# Altium PCB Piezo_Regulator_Head.PcbDoc (part 1 of 4)
Units mil, origin at the board's own origin, x right, y up, seen from the top; angles counter-clockwise.
Board outline 2047.24 x 1850.39 mil, 6 copper layers (Top Layer, GROUND, SIGNAL1, SIGNAL2, POWER, Bottom Layer), stack 60.866 mil thick; 136 components, 91 nets, 517 pads, 213 vias.
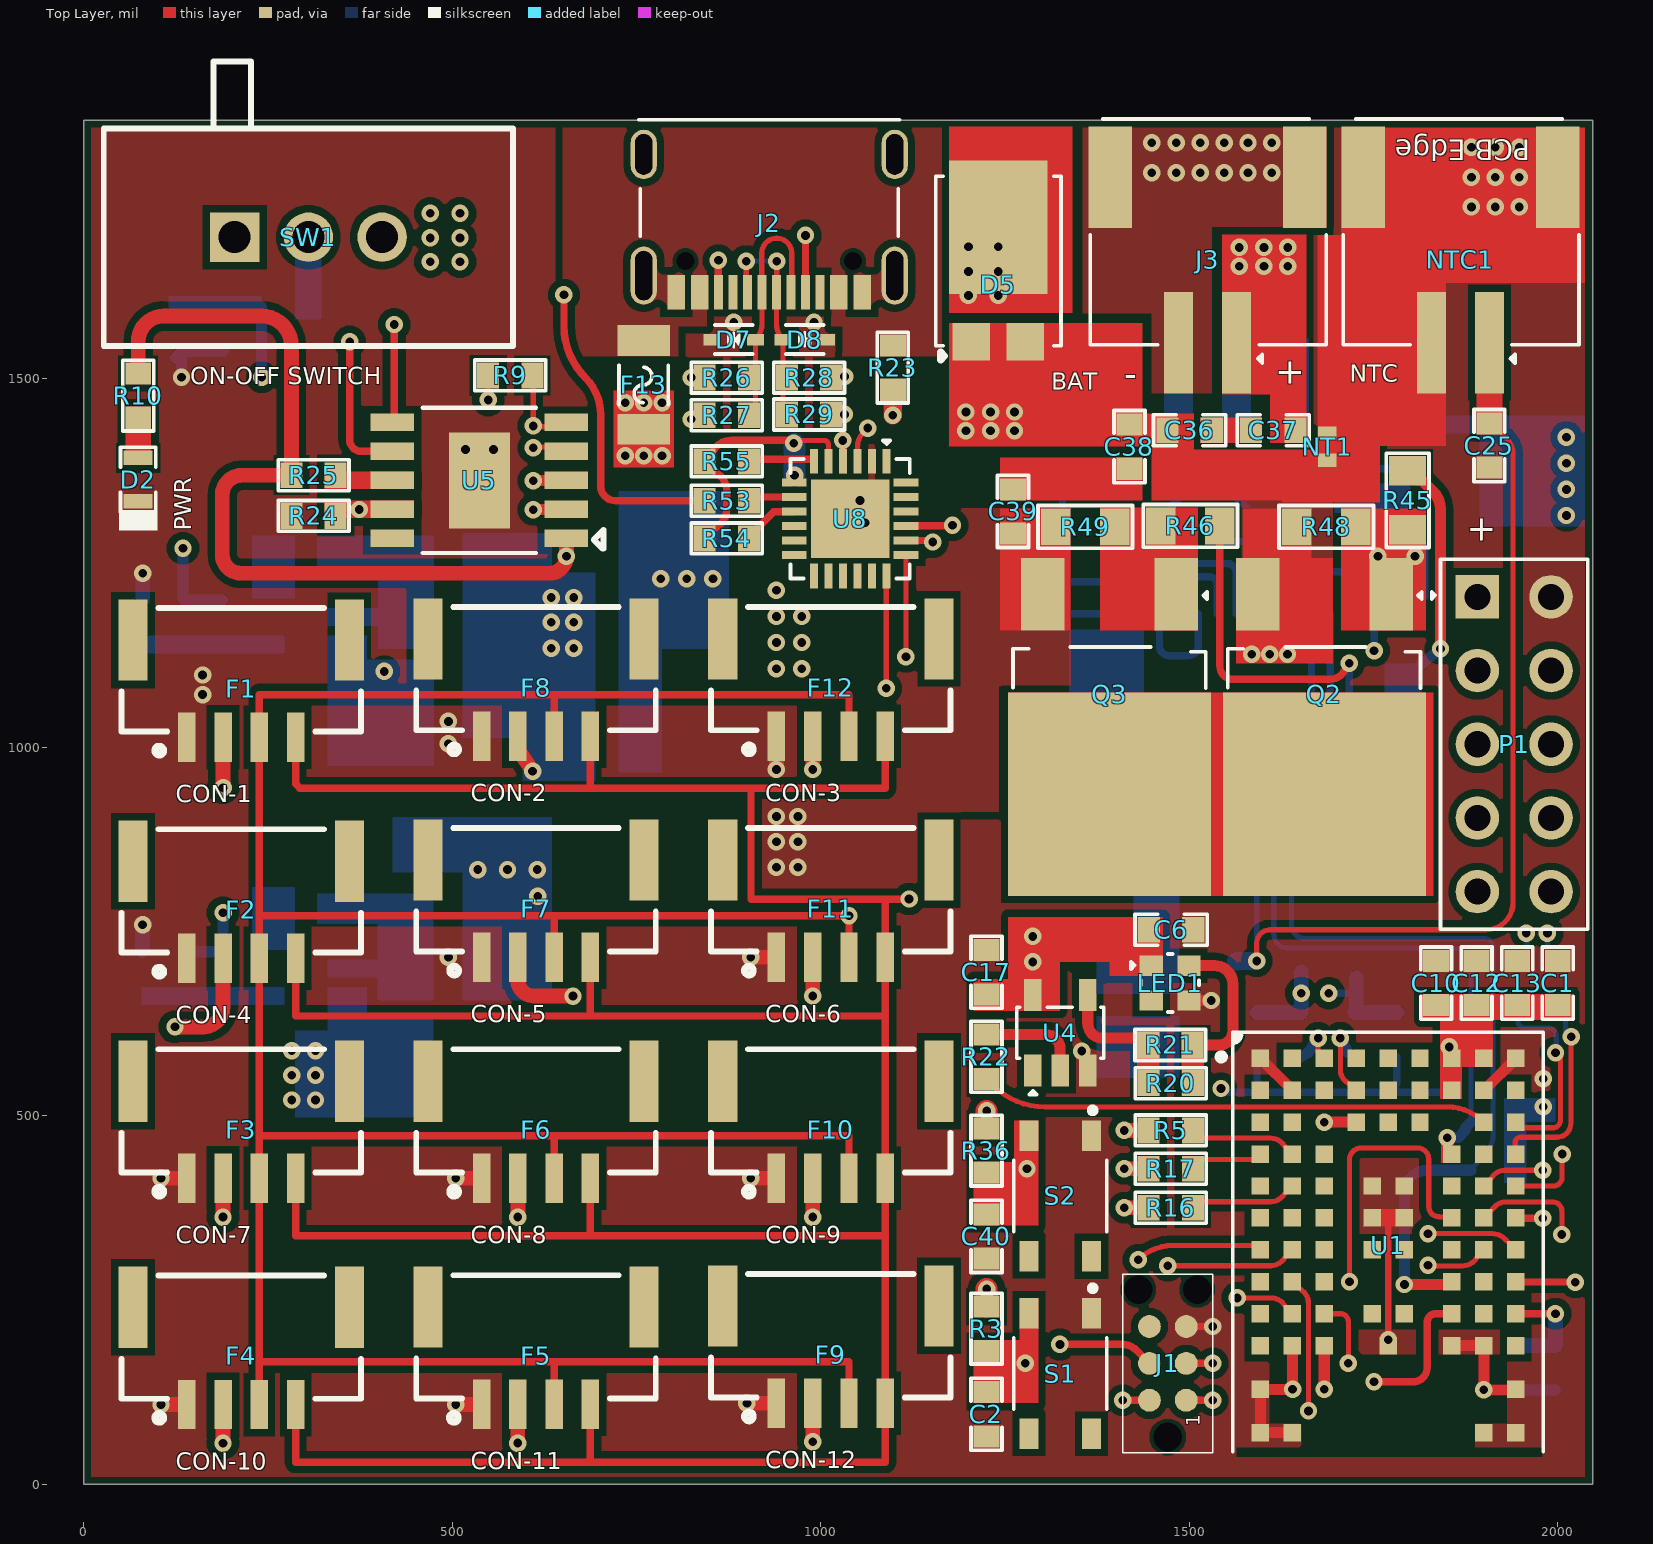
[diagram p0: Top Layer view]
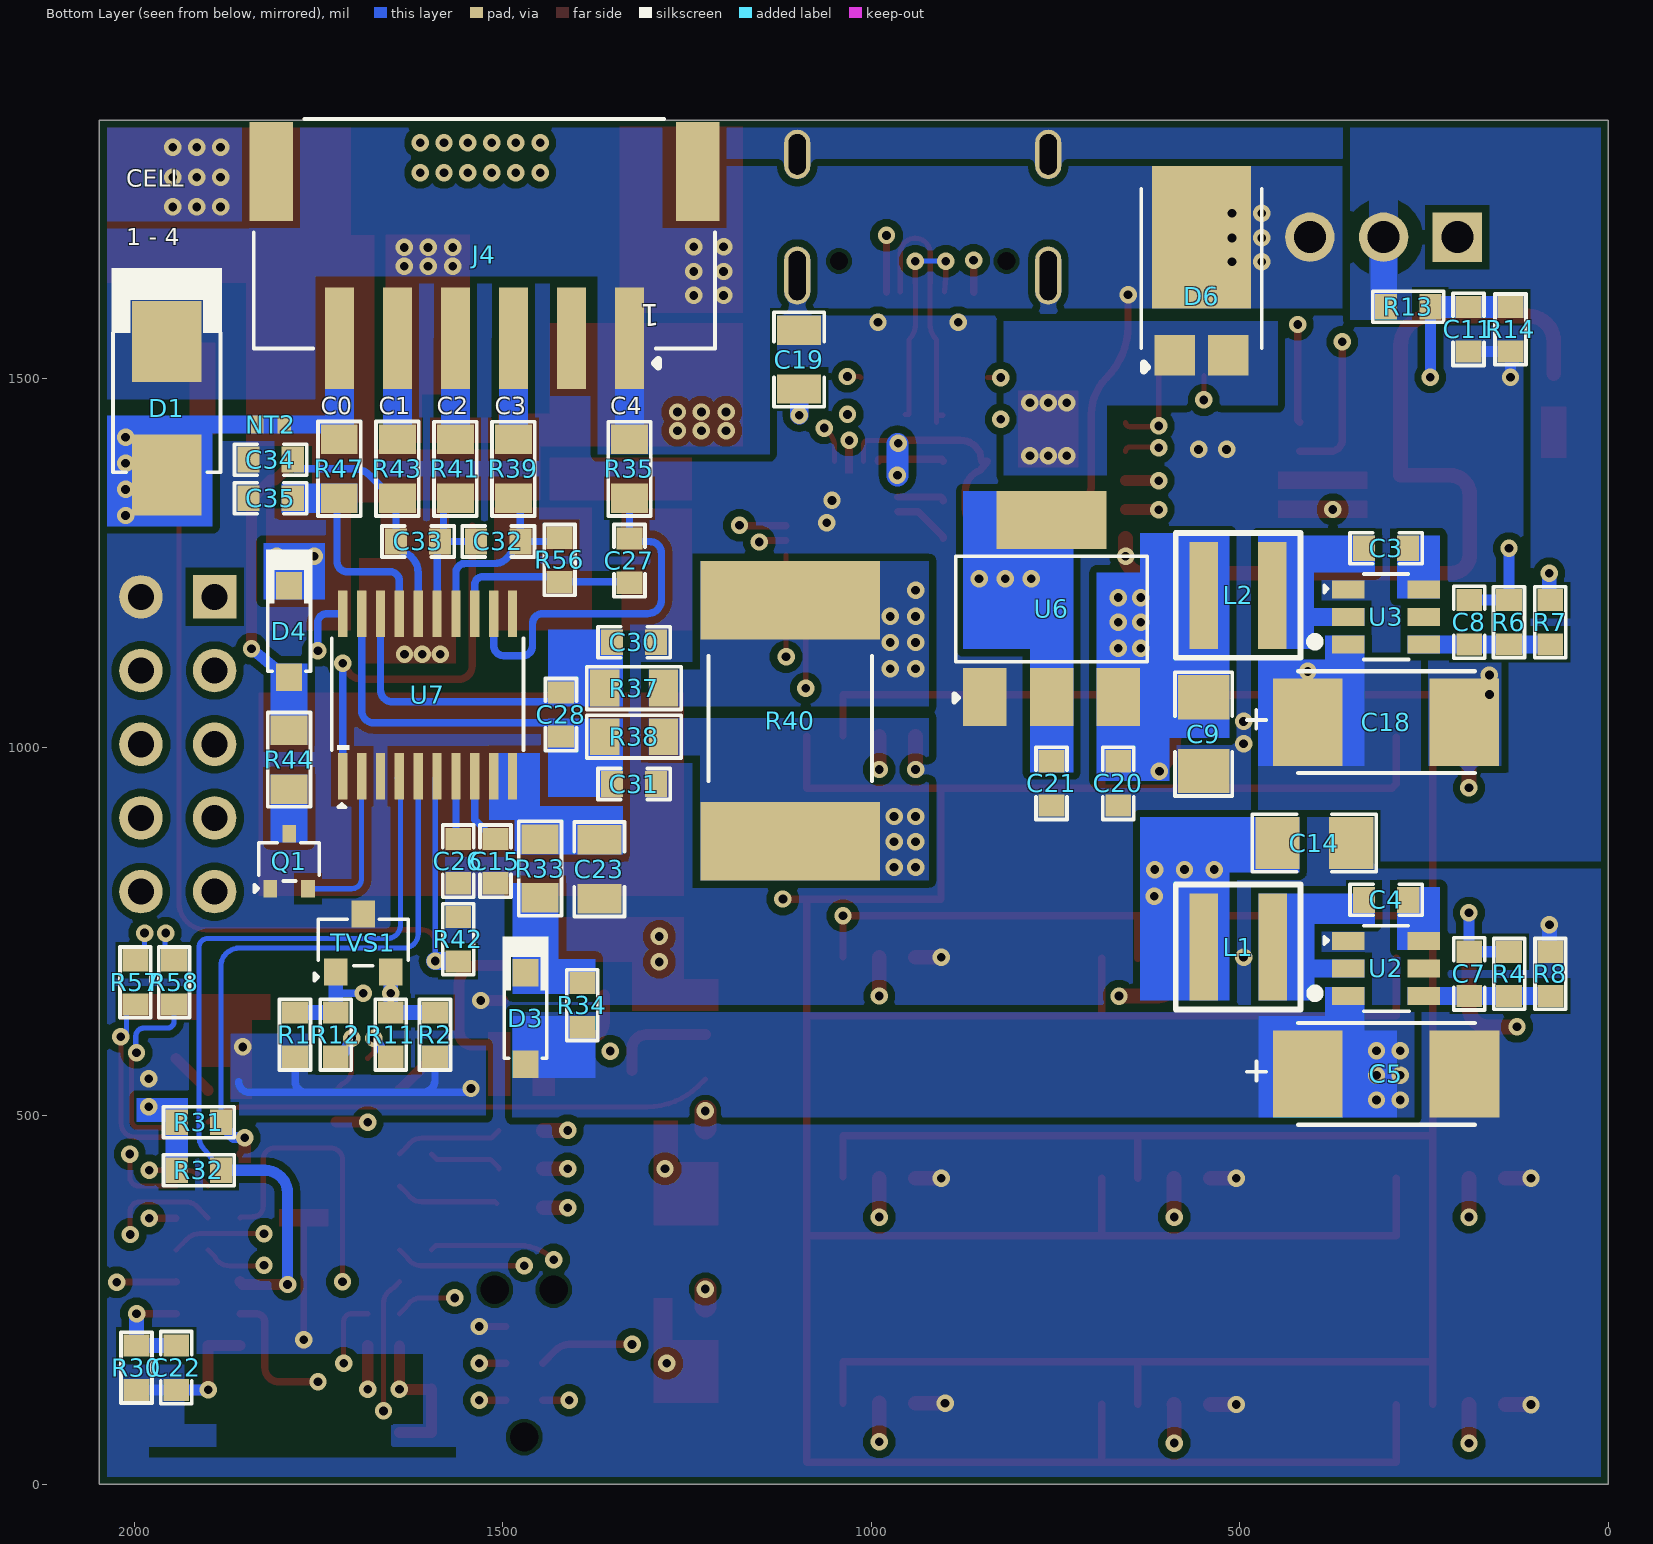
[diagram p1: Bottom Layer view, seen from below]
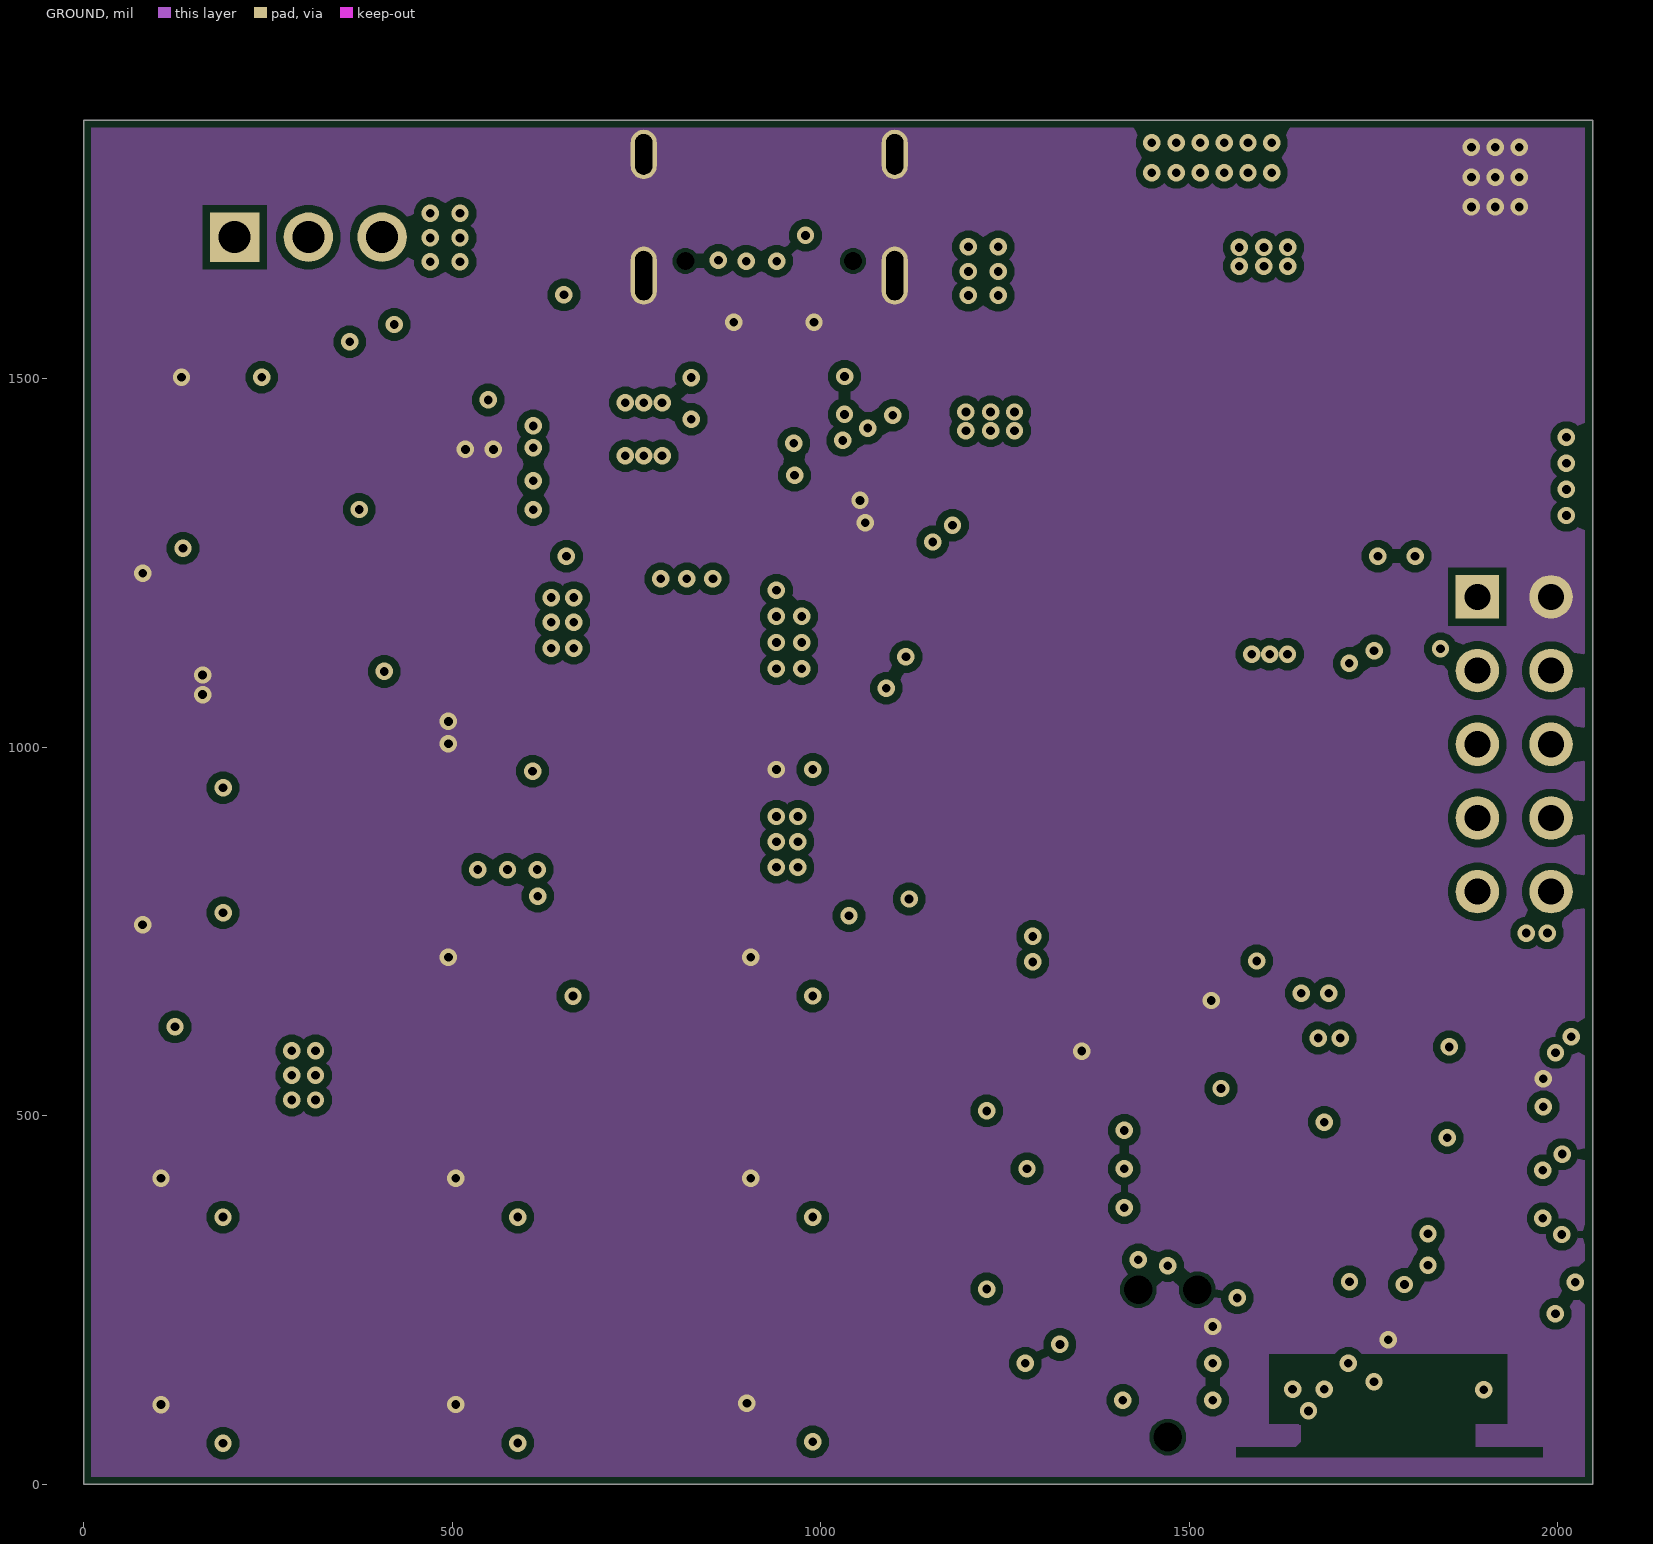
[diagram p2: GROUND]
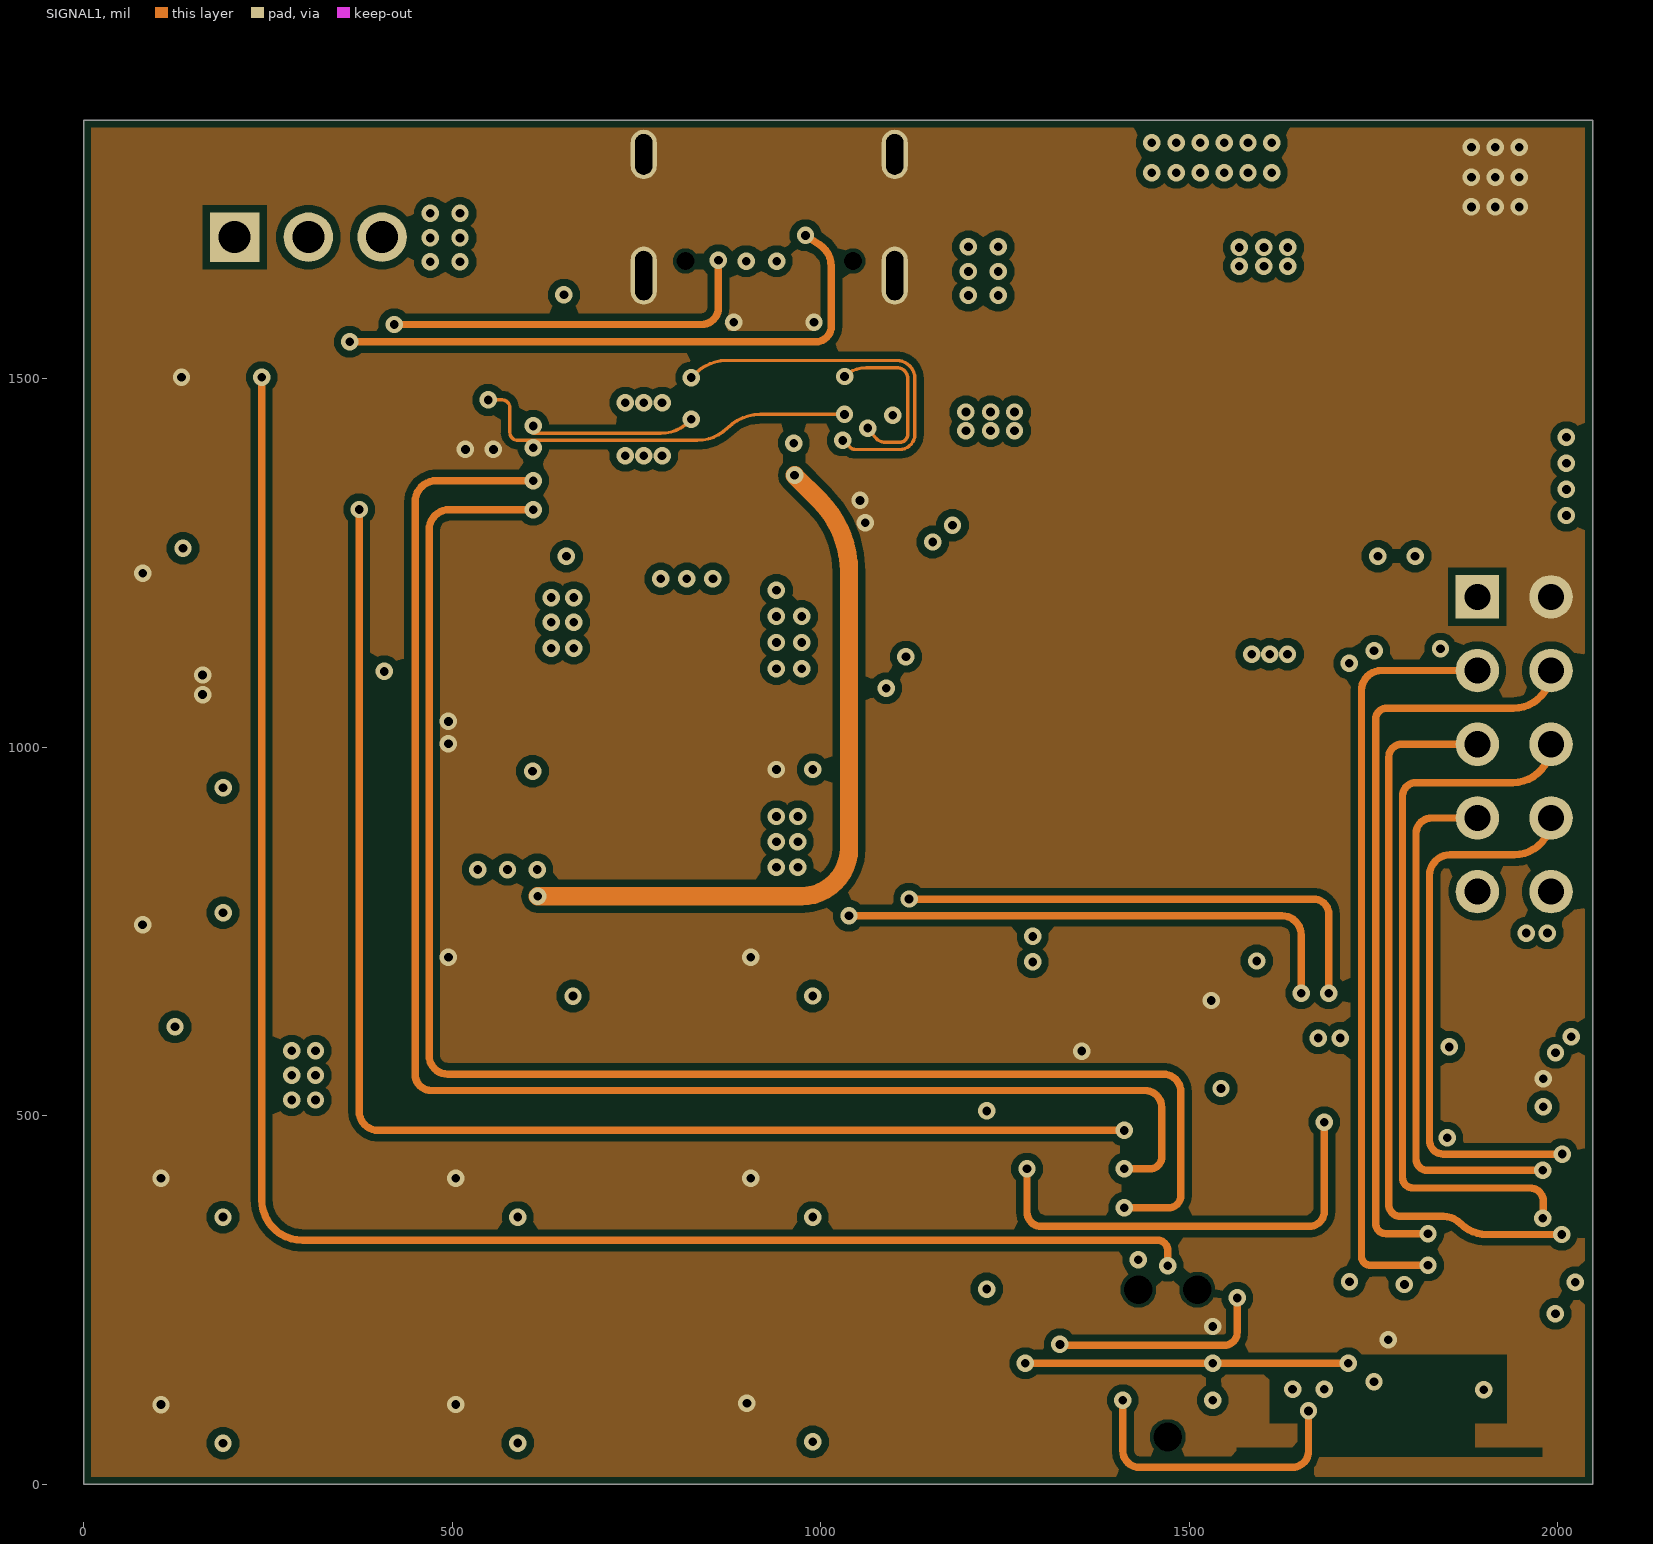
[diagram p3: SIGNAL1]
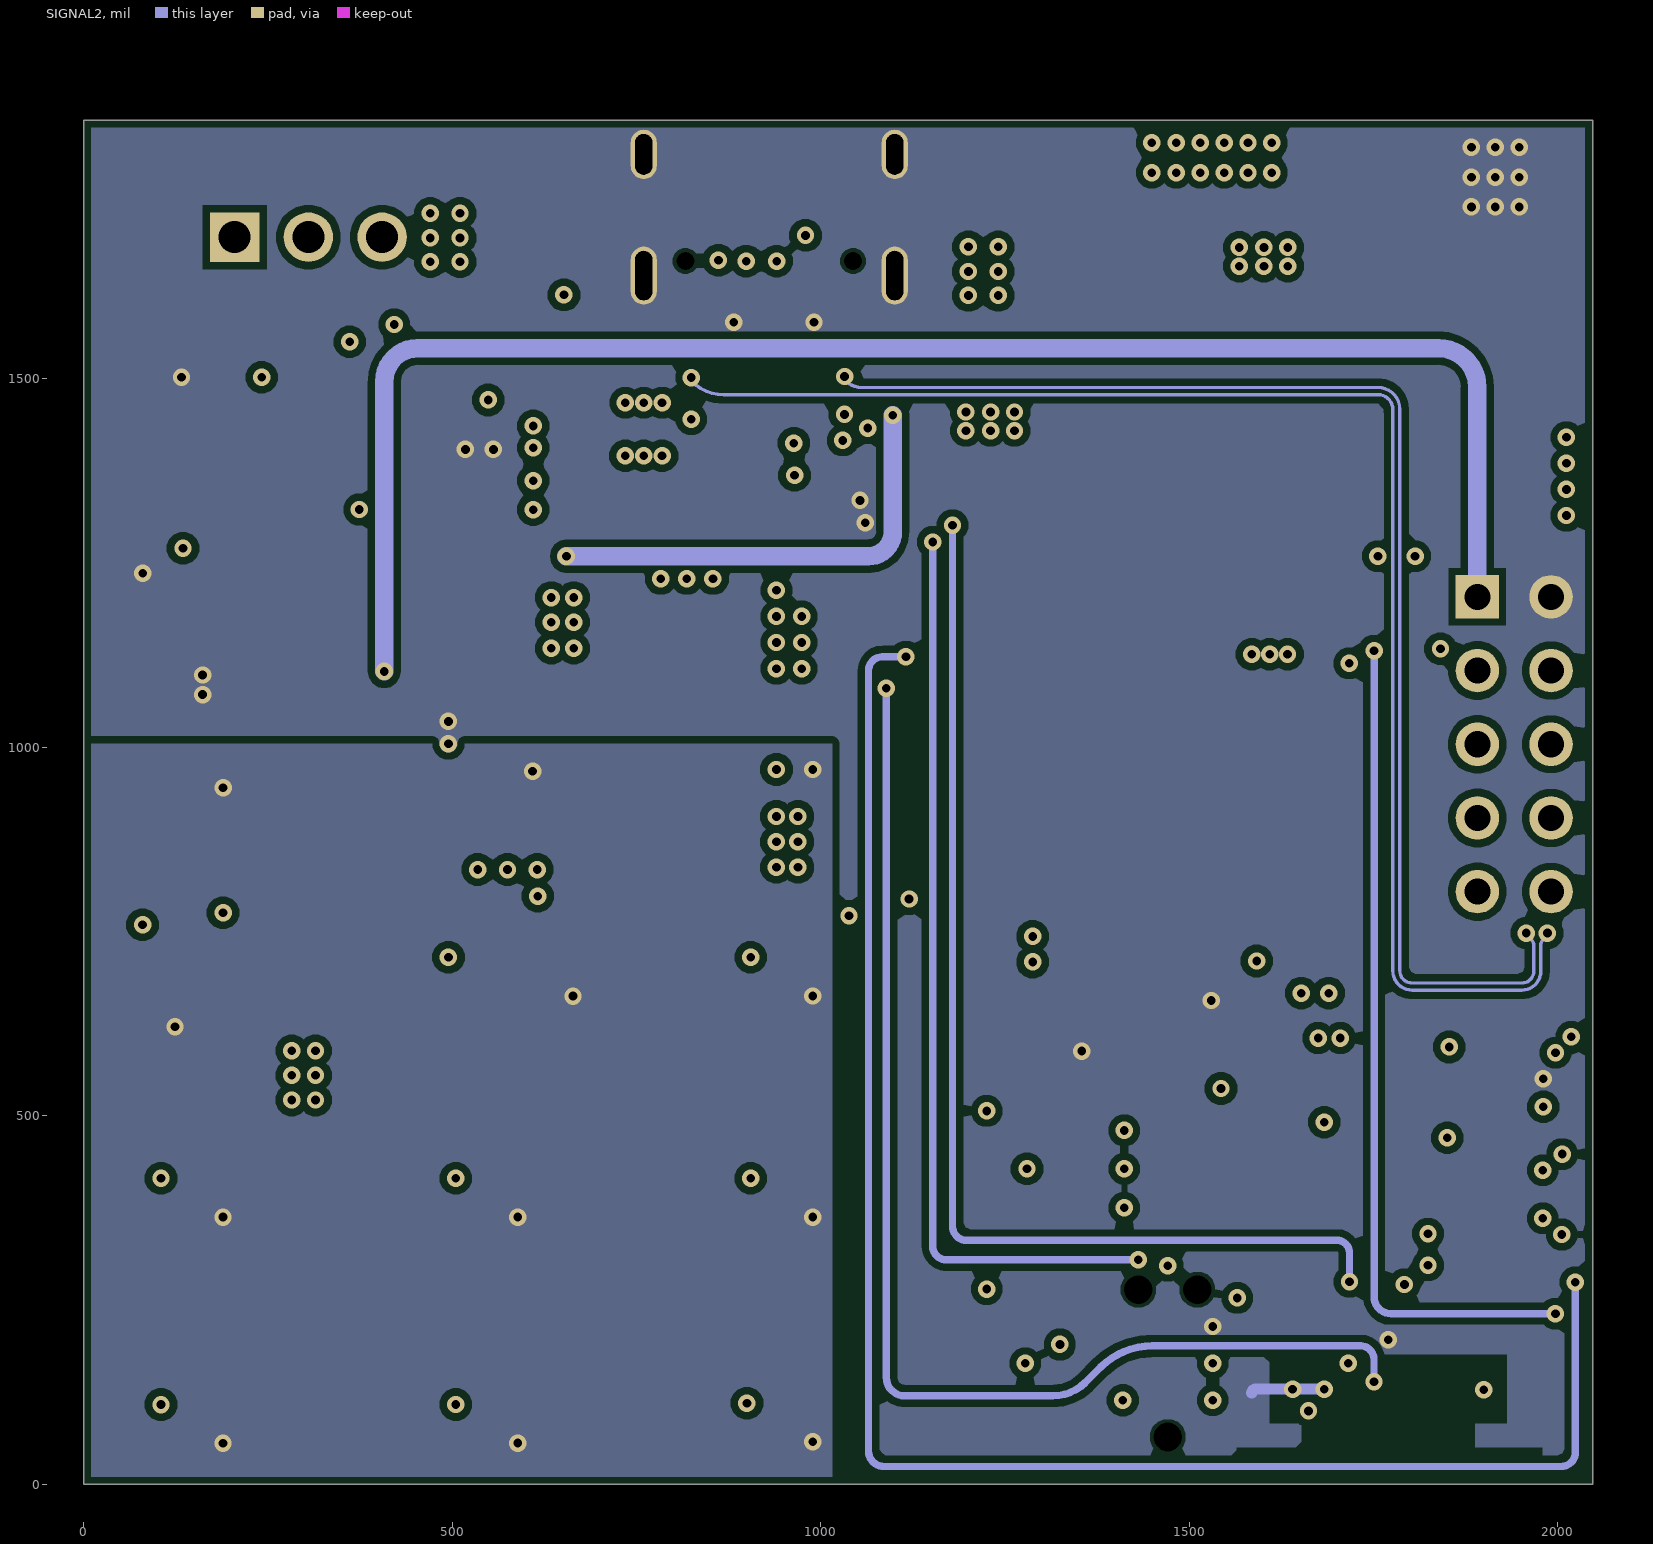
[diagram p4: SIGNAL2]
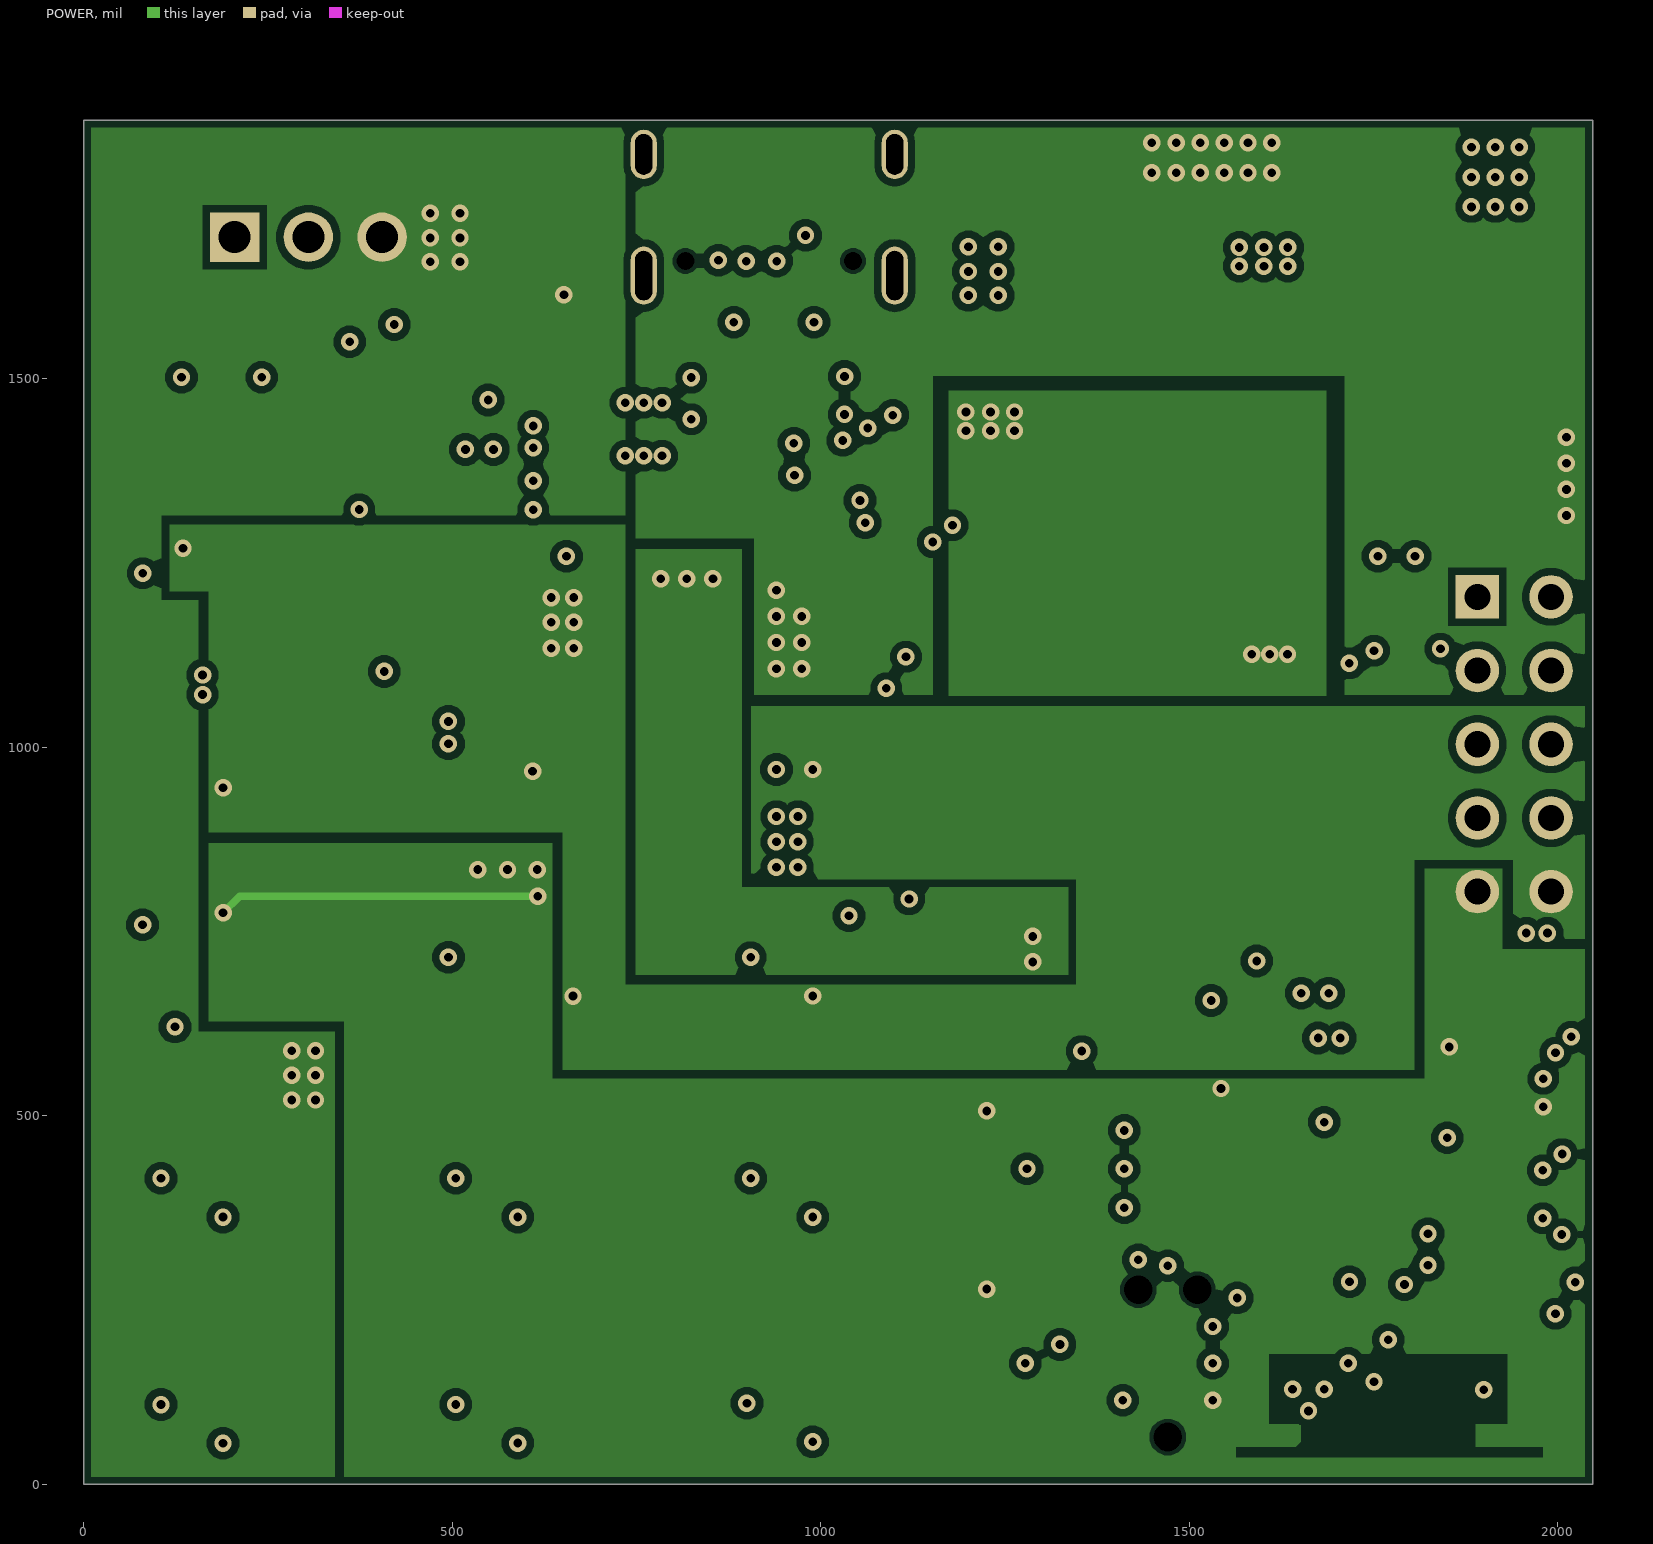
[diagram p5: POWER]
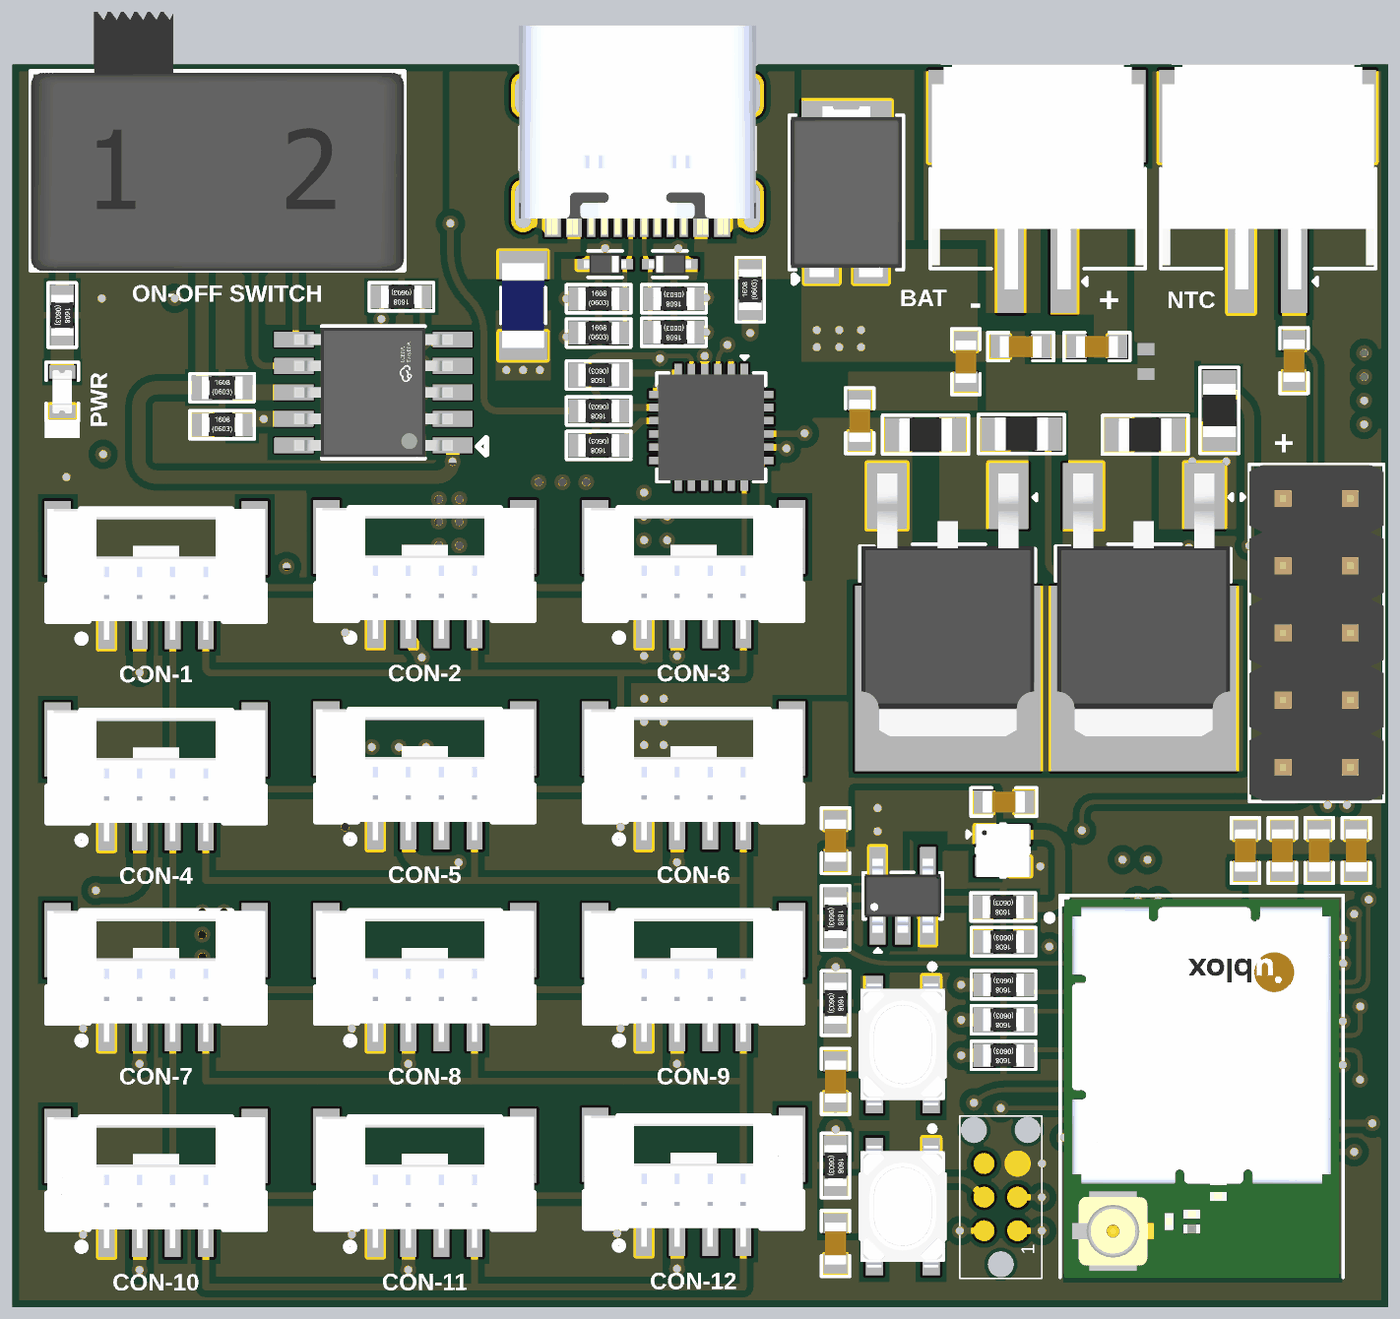
[diagram p7: 3D render of the assembled board from above, using the file's embedded part models]
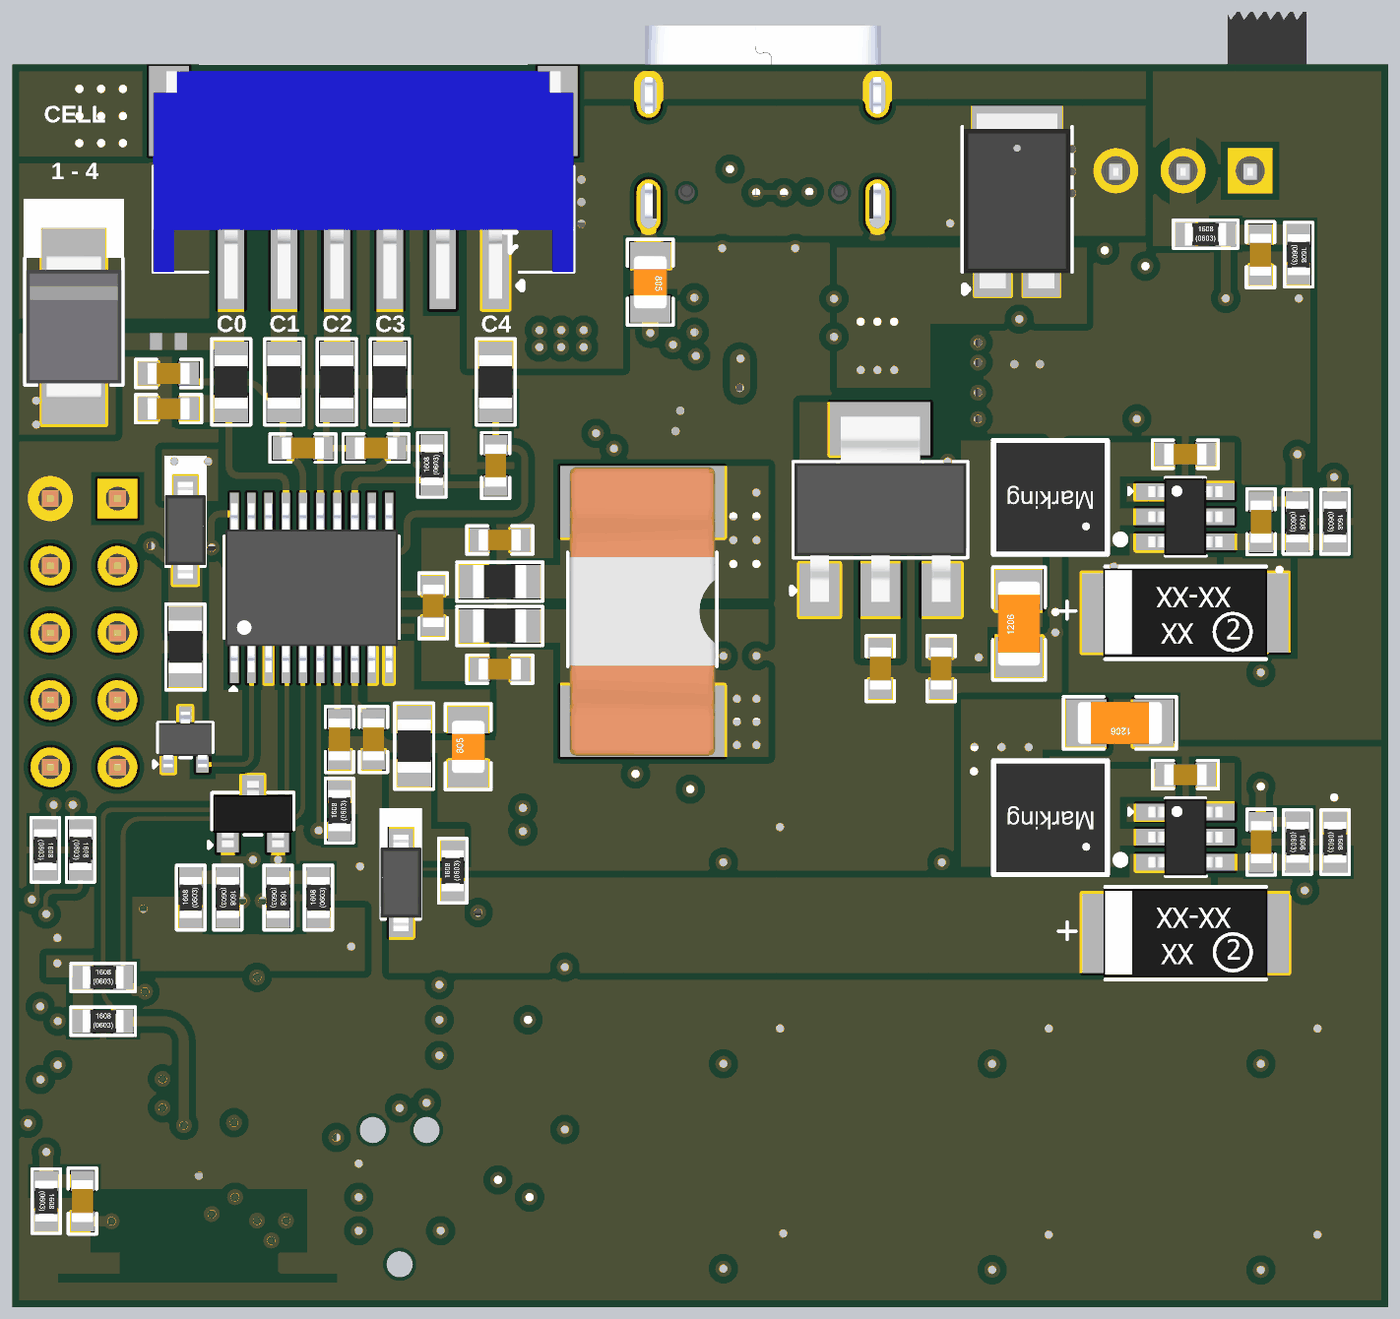
[diagram p8: 3D render of the assembled board from below, using the file's embedded part models]

## Layer stack, top to bottom
Top Solder: solder mask 0.4, Solder Resist, Dk 3.5
Top Layer: signal copper 1.378
Dielectric 2: prepreg 3.9134, PP-006, Dk 4.4
GROUND: signal copper 0.5984
Dielectric 4: prepreg 21.6535, PP-006, Dk 4.1
SIGNAL1: signal copper 0.5984
Dielectric 1: dielectric 4.5827, FR-4, Dk 4.6
SIGNAL2: signal copper 0.5984
Dielectric 5: prepreg 21.6535, PP-006, Dk 4.1
POWER: signal copper 0.5984
Dielectric 3: prepreg 3.9134, PP-006, Dk 4.4
Bottom Layer: signal copper 1.378
Bottom Solder: solder mask 0.4, Solder Resist, Dk 3.5

## Board outline
0,0 0,1850.39 2047.24,1850.39 2047.24,0

## Design rules (kind name [scope] priority, off if disabled: settings)
BoardOutlineClearance [All] p1: gap=0 ignorepadtopadclearanceinfootprint=FALSE except(10: Poly-OutlineEdge)
Clearance [All] p1: gap=5 ignorepadtopadclearanceinfootprint=FALSE except(10: Arc-Poly Arc-Text Track-Poly Track-Text SMDPad-Poly SMDPad-Text THPad-Poly THPad-Text Via-Poly Via-Text Fill-Poly Fill-Text Poly-Poly Poly-Text Region-Text Text-Text)
ComponentClearance [All] p1: gap=0 collisioncheckmode=3 verticalgap=0 showdistances=FALSE
DiffPairsRouting [All] p1: maxlimit=12 minlimit=5 mostfreqgap=5 toplayer_mingap=12 toplayer_prefgap=12 toplayer_minwidth=7 toplayer_maxwidth=7 toplayer_prefwidth=7 midlayer1_maxgap=5 midlayer1_minwidth=4.23 midlayer1_maxwidth=4.23 midlayer1_prefwidth=4.23 midlayer2_maxgap=5 midlayer2_minwidth=4.23 midlayer2_maxwidth=4.23 midlayer2_prefwidth=4.23 midlayer3_maxgap=5 midlayer3_minwidth=4.61 midlayer3_maxwidth=4.61 midlayer3_prefwidth=4.61 midlayer4_maxgap=5 midlayer4_minwidth=4.61 midlayer4_maxwidth=4.61 midlayer4_prefwidth=4.61 bottomlayer_mingap=12 bottomlayer_prefgap=12 bottomlayer_minwidth=7 bottomlayer_maxwidth=7 bottomlayer_prefwidth=7 impedanceprofiledriven=TRUE impedanceprofileid={20A96C70-0C57-4419-ABD6-1D1F0772203B} impedanceprofilevalue=90.000000 maxuncoupledlength=1000
MinimumSolderMaskSliver [All] p1: minsoldermaskwidth=0
PolygonConnect [All] p1: connectstyle=Direct reliefconductorwidth=10 reliefentries=4 polygonreliefangle="90 Angle" airgapwidth=10
RoutingVias [All] p1: holewidth=11.81 width=23.62 viastyle="Through Hole" minholewidth=11.81 minwidth=23.62 maxholewidth=11.81 maxwidth=23.62
SilkToSilkClearance [All] p1: silktosilkclearance=0
SilkToSolderMaskClearance [IsPad] p1: minsilkscreentomaskgap=0 clearancetoexposedcopper=TRUE
SolderMaskExpansion [All] p1: expansion=4 istentingtop=FALSE
SupplyNets "Schematic Supply Nets_7" [InNet('BATT_P')] p1: voltage=0.000
SupplyNets "Schematic Supply Nets_5" [InNet('3V3')] p2: voltage=0.000
SupplyNets "Schematic Supply Nets_4" [InNet('GND')] p3: voltage=0.000
SupplyNets "Schematic Supply Nets_3" [InNet('12V')] p4: voltage=0.000
SupplyNets "Schematic Supply Nets_2" [InNet('20V')] p5: voltage=0.000
SupplyNets "Schematic Supply Nets_1" [InNet('5V')] p6: voltage=0.000
SupplyNets "Schematic Supply Nets" [InNet('VDD_20V')] p7: voltage=0.000
Width [All] p1: maxlimit=40 minlimit=4 preferedwidth=10 midlayer1_minwidth=10 midlayer2_minwidth=10 midlayer3_minwidth=10 midlayer4_minwidth=10 minimp=50.000000 maximp=50.000000 favimp=50.000000
25 further rules are at their usual default settings.

## Classes and differential pairs
differential pair class D1_Lines: CH_D USB_D
net class D1: CH_D_N CH_D_P USB_D_N USB_D_P
differential pair class USB_DIF: USB_D
component class Piezo_Regulator_Head_Power: C3 C4 C5 C7 C8 C9 C14 C15 C18 C19 C20 C21 C22 C23 C25 C26 C27 C28 C30 C31 C32 C33 C34 C35 C36 C37 C38 C39 D1 D2 D3 D4 D5 D6 D7 D8 F1 F2 F3 F4 F5 F6 F7 F8 F9 F10 F11 F12 F13 J2 J3 J4 J6 L1 L2 NT1 NT2 NTC1 Q1 Q2 Q3 R4 R6 R7 R8 R9 R10 R23 R24 R25 R26 R27 R28 R29 R30 R31 R32 R33 R34 R35 R37 R38 R39 R40 R41 R42 R43 R44 R45 R46 R47 R48 R49 R53 R54 R55 R56 SW1 U2 U3 U5 U6 U7 U8
component class Piezo_Regulator_Head_MCU: C1 C2 C6 C10 C11 C12 C13 C17 C40 J1 LED1 P1 R1 R2 R3 R5 R11 R12 R13 R14 R16 R17 R20 R21 R22 R36 R57 R58 S1 S2 TVS1 U1 U4
differential pair CH_D: +CH_D_P -CH_D_N
differential pair USB_D: +USB_D_P -USB_D_N
differential pair D: +D_P -D_N

## Components (designator, comment, footprint, x,y, rotation, side; value= is the part's Value field where it differs from the comment)
C1 "4.7uF" Cap-0603 2000,680 r270 top value=4.7µF
C2 "100nF" Cap-0603 1225,95 r90 top
C3 "100nF" Cap-0603 301.67,1269.88 r0 bottom
C4 "100nF" Cap-0603 301.48,792.88 r0 bottom
C5 "10uF" Case-C 301.48,556.88 r180 bottom
C6 "100nF" Cap-0603 1475.48,752.26 r180 top
C7 "47pF" Cap-0603 188.66,692.47 r90 bottom
C8 "47pF" Cap-0603 188.85,1169.48 r90 bottom
C9 "15uF" Cap-1206 549.13,1017.88 r90 bottom value=15µF
C10 "100nF" Cap-0603 1835,680 r270 top
C11 "10000pF" Cap-0603 189.81,1567 r90 bottom
C12 "100nF" Cap-0603 1890,680 r270 top
C13 "100nF" Cap-0603 1945,680 r270 top
C14 "15uF" Cap-1206 399,870 r0 bottom value=15µF
C15 "100nF" Cap-0603 1510.02,845.41 r90 bottom
C17 "100nF" Cap-0603 1225.01,694.62 r270 top
C18 "10uF" Case-C 301.67,1033.88 r180 bottom
C19 "1uF" Cap-0805 1098,1526 r270 bottom
C20 "10uF" Cap-0603 665,950.96 r90 bottom
C21 "10uF" Cap-0603 755.55,950.96 r90 bottom
C22 "470pF" Cap-0603 1943.15,158.11 r90 bottom
C23 "2.2uF" Cap-0805 1369,834.41 r90 bottom
C25 "4.7nF" Cap-0603 1907.37,1409.26 r90 top
C26 "1uF" Cap-0603 1560.61,845.41 r90 bottom
C27 "1uF" Cap-0603 1328.15,1253.17 r90 bottom
C28 "100nF" Cap-0603 1421,1044.27 r90 bottom
C30 "100nF" Cap-0603 1322,1142.27 r180 bottom
C31 "100nF" Cap-0603 1322,950 r0 bottom
C32 "1uF" Cap-0603 1506.14,1279.17 r180 bottom
C33 "1uF" Cap-0603 1615,1279.17 r180 bottom
C34 "1uF" Cap-0603 1815,1390.15 r180 bottom
C35 "1uF" Cap-0603 1815,1337.79 r180 bottom
C36 "100nF" Cap-0603 1500.63,1430.12 r180 top
C37 "100nF" Cap-0603 1614.11,1430.12 r180 top
C38 "100nF" Cap-0603 1419,1407.76 r90 top
C39 "100nF" Cap-0603 1261,1319.84 r90 top
C40 "100nF" Cap-0603 1225,336.21 r90 top
D1 "SMBJ24A" SMB_ 1956,1460 r90 bottom
D2 "QBLP617-IB" LED-0603 74,1363 r270 top
D3 "1N4148W-7-F" SOD-123 1469.23,632 r90 bottom value=2pF
D4 "1N4148W-7-F" SOD-123 1790,1157.01 r90 bottom value=2pF
D5 "SB10100L" SB10100L 1204.49,1550 r0 top
D6 "PDS760-13" Power-DI-5 552,1612 r270 bottom
D7 "ESD5B5.0ST1G" "SOD-523 (Bi-Directional)" 882.09,1553 r0 top
D8 "ESD5B5.0ST1G" "SOD-523 (Bi-Directional)" 978.43,1553 r180 top
F1 "BM04B-GHS-TBT(LF)(SN)" BM04B-GHS-TBT 213.82,1105 r180 top
F2 "BM04B-GHS-TBT(LF)(SN)" BM04B-GHS-TBT 213.82,805 r180 top
F3 "BM04B-GHS-TBT(LF)(SN)" BM04B-GHS-TBT 213.82,506.54 r180 top
F4 "BM04B-GHS-TBT(LF)(SN)" BM04B-GHS-TBT 213.82,199.65 r180 top
F5 "BM04B-GHS-TBT(LF)(SN)" BM04B-GHS-TBT 613.82,200 r180 top
F6 "BM04B-GHS-TBT(LF)(SN)" BM04B-GHS-TBT 613.82,506.54 r180 top
F7 "BM04B-GHS-TBT(LF)(SN)" BM04B-GHS-TBT 613.82,806.54 r180 top
F8 "BM04B-GHS-TBT(LF)(SN)" BM04B-GHS-TBT 613.82,1106.54 r180 top
F9 "BM04B-GHS-TBT(LF)(SN)" BM04B-GHS-TBT 1013.82,201.54 r180 top
F10 "BM04B-GHS-TBT(LF)(SN)" BM04B-GHS-TBT 1013.82,506.54 r180 top
F11 "BM04B-GHS-TBT(LF)(SN)" BM04B-GHS-TBT 1013.82,806.54 r180 top
F12 "BM04B-GHS-TBT(LF)(SN)" BM04B-GHS-TBT 1013.82,1106.54 r180 top
F13 "0458005.DR" "Fuse 1206 (3216 Metric)" 759.94,1491.48 r270 top
J1 "TC2030-MCP-NL" TC2030-MCP-NL 1471,164 r90 top
J2 "TYPE-C-31-M-12" TYPE-C-31-M-12_ 930.21,1710.88 r180 top
J3 "WAFER-PH2.0-2PWB" WAFER-PH2.0-2PWB 1525,1661.24 r180 top
J4 "S6B-PH-SM4-TB(LF)(SN)" S6B-PH-SM4-TB(LF)(SN) 1525,1668 r0 bottom
L1 "10uH" 78438357100 502.29,728.88 r0 bottom value=10µH
L2 "10uH" 78438357100 502.48,1205.88 r0 bottom value=10µH
LED1 "SK6812-EC20" SK6812-EC20 1474,680 r180 top
NT1 "Net Tie_SMD" "Net Tie Pad" 1687.11,1407.81 r90 top net-tie
NT2 "Net Tie_SMD" "Net Tie Pad" 1815,1437.79 r180 bottom net-tie
NTC1 "WAFER-PH2.0-2PWB" WAFER-PH2.0-2PWB 1868,1661.24 r180 top
P1 "61301021121" "HDR 2x5 TH (Male)" 1941,1004 r270 top
Q1 "BSS84W-7-F" SOT-323 1790,845.41 r180 bottom
Q2 "IPD034N06N3G" TO-252-2L 1683.54,1071.97 r180 top
Q3 "IPD034N06N3G" TO-252-2L 1392.07,1071.97 r180 top
R1 "2.2K" Res-0603 1782,610 r270 bottom
R2 "2.2K" Res-0603 1592,610 r270 bottom
R3 "10K" Res-0603 1225,211.02 r90 top
R4 "100K" Res-0603 134.66,692.48 r90 bottom value=100kR
R5 "DNP" Res-0603 1475,480.07 r0 top
R6 "100K" Res-0603 134.85,1169.48 r90 bottom value=100kR
R7 "4.99K" Res-0603 78.85,1169.48 r90 bottom value=4.99kR
R8 "22.1K" Res-0603 78.66,692.48 r90 bottom
R9 "DNP" Res-0603 578.85,1504.44 r0 top
R10 "10K" Res-0603 74,1477 r90 top
R11 "47R" Res-0603 1652,610 r90 bottom
R12 "47R" Res-0603 1726.8,610 r90 bottom
R13 "1M" Res-0603 271.54,1597.51 r0 bottom
R14 "120K" Res-0603 132.81,1567 r90 bottom value=120kR
R16 "DNP" Res-0603 1475,375 r0 top
R17 "DNP" Res-0603 1475,427.95 r0 top
R20 "DNP" Res-0603 1475,544.21 r0 top
R21 "470R" Res-0603 1474.48,596 r0 top
R22 "47R" Res-0603 1225,580 r90 top
R23 "1K" Res-0603 1098,1515 r270 top
R24 "DNP" Res-0603 311.97,1313.82 r180 top
R25 "10K" Res-0603 311.97,1369 r180 top
R26 "0R" Res-0603 872.56,1501.48 r180 top
R27 "DNP" Res-0603 872.56,1450.46 r180 top
R28 "0R" Res-0603 984.43,1501.48 r0 top
R29 "DNP" Res-0603 984.41,1451.49 r0 top
R30 "499K" Res-0603 1996.95,158.11 r90 bottom
R31 "4.7K" Res-0603 1912.37,491.26 r0 bottom
R32 "4.7K" Res-0603 1912.37,426 r0 bottom
R33 "100R" RES-0805 1449.37,835.41 r90 bottom
R34 "10K" Res-0603 1392.07,650 r270 bottom
R35 "100R" RES-0805 1328.15,1377.7 r270 bottom
R36 "10K" Res-0603 1225,452.76 r90 top
R37 "100R" RES-0805 1322,1080.27 r0 bottom
R38 "100R" RES-0805 1322,1014.27 r0 bottom
R39 "100R" RES-0805 1485.63,1377.73 r270 bottom
R40 "1mΩ" "RES 3920" 1110,1036 r270 bottom
R41 "100R" RES-0805 1564.37,1377.76 r270 bottom
R42 "10K" Res-0603 1560.61,739.43 r270 bottom
R43 "100R" RES-0805 1643.11,1377.79 r270 bottom
R44 "1K" RES-0805 1790,983.12 r270 bottom value=1kR
R45 "1M" RES-0805 1796.36,1335.02 r90 top value=1MR
R46 "0R" Res-0805 1501.64,1300.17 r180 top
R47 "100R" RES-0805 1721.85,1377.79 r270 bottom
R48 "1M" RES-0805 1686,1299 r0 top value=1MR
R49 "1M" RES-0805 1359,1299 r0 top value=1MR
R53 "10K" Res-0603 872.56,1334.44 r0 top
R54 "1K" Res-0603 872.56,1283.26 r0 top value=1kR
R55 "DNP" Res-0603 872.56,1387.76 r0 top
R56 "0R" Res-0603 1423,1254.17 r270 bottom
R57 "DNP" Res-0603 1998.53,681 r90 bottom
R58 "DNP" Res-0603 1946,681 r90 bottom
S1 "SKRPABE010" SKRPABE010 1325,150 r270 top
S2 "SKRPABE010" SKRPABE010 1325,391.21 r270 top
SW1 "25336NA" 25336NA 305,1737.28 r180 top
TVS1 "NUP2105LT1G" SOT-23 1689.4,734.37 r180 bottom value=30pF
U1 "NORA-B120-00B" NORA-B120-00B 1769.92,361.34 r180 top locked
U2 "TPS54202DDCR" "SOT-23-6 THIN" 301.48,699.88 r180 bottom
U3 "TPS54202DDCR" "SOT-23-6 THIN" 301.67,1176.88 r180 bottom
U4 "SN74LV1T34DBVR" SOT-23-5 1325,612.73 r90 top
U5 "CH224K" ESSOP-10-150mil-1mm 537,1362 r180 top
U6 "AMS1117-5.0" "SOT- 223" 755.55,1187.96 r180 bottom
U7 "BQ7692006PWR" TSSOP-20 1602,1071 r90 bottom
U8 "CP2102N-A02-GQFN24R" "24-WQFN (4x4)" 1040,1310 r270 top

## Footprints (in the part's own frame and the unit in brackets; to place one, negate y for a bottom-side part, rotate by r counter-clockwise, add the part's x,y. Pads: shape width x height; smd on the part's side, far side on the other; paste and mask are expansions set on the pad)
"24-WQFN (4x4)" [mm]
  rect 0.85x0.28 smd: 1(-1.975,1.25) 2(-1.975,0.75) 3(-1.975,0.25) 4(-1.975,-0.25) 5(-1.975,-0.75) 6(-1.975,-1.25) 13(1.975,-1.25) 14(1.975,-0.75) 15(1.975,-0.25) 16(1.975,0.25) 17(1.975,0.75) 18(1.975,1.25)
  rect 0.28x0.85 smd: 7(-1.25,-1.925) 8(-0.75,-1.925) 9(-0.25,-1.925) 10(0.25,-1.925) 11(0.75,-1.925) 12(1.25,-1.925) 19(1.25,1.925) 20(0.75,1.925) 21(0.25,1.925) 22(-0.25,1.925) 23(-0.75,1.925) 24(-1.25,1.925)
  rect 2.7x2.7 smd: 25(0,0)
  silkscreen extent -2.69,-2.06 2.06,2.06, body extent -2,-2 2,2, height 0.8
25336NA [mm]
  rect 1.7x1.7 hole 1.1 paste-2539.97 mask+0: 1(2.54,1.15)
  round 1.7 hole 1.1 paste-2539.97 mask+0: 2(-2.54,1.15) 3(0,1.15)
  silkscreen extent -7.05,-4.9 7.05,4.9, body extent -7.05,-4.86 7.05,4.94, height 8.1
78438357100 [mm]
  rect 0.98x3.7 smd: 1(-1.185,0) 2(1.185,0)
  silkscreen extent -2.75,-2.15 2.15,2.15, body extent -2.05,-2.05 2.05,2.05, height 3.1
BM04B-GHS-TBT [mm]
  rect 0.6x1.7 smd: 1(1.875,2.325) 2(0.625,2.325) 3(-0.625,2.325) 4(-1.875,2.325)
  rect 1x2.8 smd: 5(-3.725,-1.025) 6(3.725,-1.025)
  silkscreen extent -4.13,-2.12 4.13,2.12, body extent -4.13,-2.12 4.13,2.83, height 4.05
Cap-0603 [mil]
  rect 30x35 smd mask+2.36: 1(-30,0) 2(30,0)
  silkscreen extent -49,-21 49,21, body extent -32,-16 31,16, height 34
Cap-0805 [mil] "SMD 0805"
  rect 40x60 smd mask+2.76: 1(-40,0) 2(40,0)
  silkscreen extent -64,-34 64,34, body extent -39,-25 39,25, height 30
Cap-1206 [mil] "SMD 1206"
  rect 60x70 smd: 1(-50,0) 2(50,0)
  silkscreen extent -84,-39 84,39, body extent -63,-31 63,32, height 39
Case-C [mm]
  rect 2.4x3 smd: 1(-2.7,0) 2(2.7,0)
  silkscreen extent -4.8,-1.75 3.05,1.75, body extent -3.1,-1.67 3.1,1.68, height 2.46
ESSOP-10-150mil-1mm [mm]
  rect 1.5x0.6 smd paste+0 mask+0.05: 1(-3,2) 2(-3,1) 3(-3,0) 4(-3,-1) 5(-3,-2) 6(3,-2) 7(3,-1) 8(3,0) 9(3,1) 10(3,2)
  rect 2.1x3.3 smd paste+0 mask+0.05: 11(0,0)
  silkscreen extent -4.28,-2.5 1.95,2.5, body extent -3,-2.45 3,2.45, height 1.54
"Fuse 1206 (3216 Metric)" [mm] "0.126\" L x 0.062\" W x 0.026\" H (3.20mm x 1.58mm x 0.65mm)"
  rect 1.06x1.82 smd: 1(-1.528,0) 2(1.528,0)
  silkscreen extent -0.68,-0.85 0.68,0.85, body extent -1.6,-0.79 1.6,0.79, height 0.85
"HDR 2x5 TH (Male)" [mm]
  rect 1.5x1.5 hole 0.9: 1(-5.08,-1.27)
  round 1.5 hole 0.9: 2(-5.08,1.27) 3(-2.54,-1.27) 4(-2.54,1.27) 5(0,-1.27) 6(0,1.27) 7(2.54,-1.27) 8(2.54,1.27) 9(5.08,-1.27) 10(5.08,1.27)
  silkscreen extent -6.38,-2.84 6.38,2.54, body extent -6.35,-2.54 6.35,2.54, height 8.77
LED-0603 [mm]
  rect 0.5x1 smd: 1(-0.75,0) 2(0.75,0)
  silkscreen extent -1.12,-0.66 1.75,0.66, body extent -0.82,-0.37 0.82,0.36, height 0.68
"Net Tie Pad" [mil]
  rect 18x25 smd mask-10: 1(-18.5,0) 2(18.5,0)
  Top Layer region: -22.5,-71.78 18.5,-71.78 18.5,12.5 -22.5,12.5
NORA-B120-00B [mm]
  rect 0.6x0.6 smd: A1(4.4,-5.5) A2(3.3,-5.5) A3(2.2,-5.5) A4(1.1,-5.5) A5(0,-5.5) A6(-1.1,-5.5) A7(-2.2,-5.5) A8(-3.3,-5.5) A9(-4.4,-5.5) B1(4.4,-4.4) B2(3.3,-4.4) B3(2.2,-4.4) B4(1.1,-4.4) B5(0,-4.4) B6(-1.1,-4.4) B7(-2.2,-4.4) B8(-3.3,-4.4) B9(-4.4,-4.4) C1(4.4,-3.3) C2(3.3,-3.3) C4(1.1,-3.3) C5(0,-3.3) C6(-1.1,-3.3) C8(-3.3,-3.3) C9(-4.4,-3.3) D1(4.4,-2.2) D2(3.3,-2.2) D3(2.2,-2.2) D7(-2.2,-2.2) D8(-3.3,-2.2) D9(-4.4,-2.2) E1(4.4,-1.1) E2(3.3,-1.1) E3(2.2,-1.1) E4(0.55,-1.1) E5(-0.55,-1.1) E7(-2.2,-1.1) E8(-3.3,-1.1) E9(-4.4,-1.1) F1(4.4,0) F2(3.3,0) F3(2.2,0) F4(0.55,0) F5(-0.55,0) F7(-2.2,0) F8(-3.3,0) F9(-4.4,0) G1(4.4,1.1) G2(3.3,1.1) G3(2.2,1.1) G4(0.55,1.1) G5(-0.55,1.1) G7(-2.2,1.1) G8(-3.3,1.1) G9(-4.4,1.1) H1(4.4,2.2) H2(3.3,2.2) H3(2.2,2.2) H7(-2.2,2.2) H8(-3.3,2.2) H9(-4.4,2.2) J1(4.4,3.3) J2(3.3,3.3) J3(2.2,3.3) J4(0.55,3.3) J5(-0.55,3.3) J7(-2.2,3.3) J8(-3.3,3.3) J9(-4.4,3.3) K1(4.4,4.4) K2(3.3,4.4) K3(2.2,4.4) K5(0,4.4) K7(-2.2,4.4) K8(-3.3,4.4) K9(-4.4,4.4) L1(4.4,5.9) L9(-4.4,5.9) M1(4.4,7.4) M2(3.3,7.4) M8(-3.3,7.4) M9(-4.4,7.4)
  Multi-Layer pour cut-out: 4.1,7.1 3.001,7.1 2.998,7.9 5.225,7.9 5.225,8.25 -5.325,8.25 -5.325,7.9 -3,7.9 -3,7.1 -4.1,7.1 -4.1,4.7 4.1,4.7
  silkscreen extent -5.35,-6.4 5.85,8.05, body extent -5.2,-6.25 5.2,8.05, height 1.85
Power-DI-5 [mm]
  rect 1.4x1.4 smd paste+0 mask+0.051: 1(2.032,-0.92) 2(2.032,0.92)
  rect 4.9x3.4 smd paste+0 mask+0.051: 3(-2.032,0)
  silkscreen extent -3.7,-2.07 2.57,2.07, body extent -4.19,-2.02 2.41,2.02, height 1.2
"RES 3920" [mm]
  rect 2.7x6.2 smd: 1(-4.15,0) 2(4.15,0)
  silkscreen extent -2.24,-2.82 2.08,2.82, body extent -5.46,-2.75 5.46,2.77, height 1.99
Res-0603 [mil]
  rect 30x35 smd: 1(-30,0) 2(30,0)
  silkscreen extent -48,-21 48,21, body extent -31,-17 31,17, height 18
RES-0805 [mil] "SMD 0805"
  rect 40x50 smd: 1(-40,0) 2(40,0)
  silkscreen extent -64,-29 64,29, body extent -39,-25 39,24, height 24
Res-0805 [mil] "SMD 0805"
  rect 40x50 smd: 1(-40,0) 2(40,0)
  silkscreen extent -64,-29 64,29, body extent -39,-25 39,24, height 24
S6B-PH-SM4-TB(LF)(SN) [mm]
  rect 1x3.5 smd: 1(-5,2.875) 2(-3,2.875) 3(-1,2.875) 4(1,2.875) 5(3,2.875) 6(5,2.875)
  rect 1.5x3.4 smd: MP1(-7.35,-2.875) MP2(7.35,-2.875)
  silkscreen extent -7.95,-4.68 7.95,3.86, body extent -7.95,-4.38 7.95,4.22, height 5.6
SB10100L [mm]
  rect 1.3x1.3 smd: 1(0,0) 2(1.86,0)
  rect 3.4x4.6 smd: 3(0.93,3.95)
  silkscreen extent -1.23,-0.62 3.09,5.71, body extent -1.17,-0.41 3.03,6.04, height 1.2
SK6812-EC20 [mm]
  rect 0.8x0.7 smd: 1(0.65,-0.6) 2(0.65,0.6) 3(-0.65,0.6) 4(-0.65,-0.6)
  silkscreen extent -1,-1 1.35,1, body extent -1,-1 1,1, height 0.65
SKRPABE010 [mm]
  rect 1.05x0.65 smd: 1(-2.075,1.075) 2(2.075,1.075) 3(-2.075,-1.075) 4(2.075,-1.075)
  silkscreen extent -3.05,-1.6 1.23,1.6, body extent -2.3,-1.6 2.3,1.6, height 2.5
SMB_ [mm]
  rect 2.8x2.4 smd: 1(-2.3,0) 2(2.3,0)
  silkscreen extent -2.21,-1.91 4.83,1.91, body extent -2.7,-1.8 2.7,1.8, height 2.3
SOD-123 [mm]
  rect 0.95x0.9 smd: 1(-1.575,0) 2(1.575,0)
  silkscreen extent -1.37,-0.8 2.82,0.8, body extent -1.82,-0.77 1.83,0.78, height 1.5
"SOD-523 (Bi-Directional)" [mm]
  rect 0.6x0.4 smd: 1(-0.75,0) 2(0.75,0)
  silkscreen extent -0.65,-0.5 0.65,0.5, body extent -0.8,-0.4 0.8,0.4, height 0.7
SOT-23 [mm] "TRANS NPN 40V 0.6A SOT23"
  rect 0.82x0.92 smd: 1(-0.95,-1) 2(0.95,-1) 3(0,1)
  silkscreen extent -1.68,-1.3 1.55,0.81, body extent -1.5,-1.25 1.5,1.25, height 1.05
SOT-23-5 [mm]
  rect 1.1x0.6 smd: 1(-1.3,0.95) 2(-1.3,0) 3(-1.3,-0.95) 4(1.3,-0.95) 5(1.3,0.95)
  silkscreen extent -2.13,-1.5 0.88,1.5, body extent -1.4,-1.45 1.4,1.45, height 1.45
"SOT-23-6 THIN" [mm]
  rect 1.12x0.62 smd: 1(-1.3,0.95) 2(-1.3,0) 3(-1.3,-0.95) 4(1.3,-0.95) 5(1.3,0) 6(1.3,0.95)
  silkscreen extent -2.13,-1.47 0.79,1.47, body extent -1.4,-1.45 1.4,1.45, height 1.44
SOT-323 [mm]
  rect 0.47x0.6 smd: 1(-0.65,-0.95) 2(0.65,-0.95) 3(0,0.95)
  silkscreen extent -1.19,-1.07 1.04,0.64, body extent -1,-1.05 1,1.05, height 1.1
"SOT- 223" [mm]
  rect 1.5x2 smd: 1(-2.3,-3.05) 2(0,-3.05) 3(2.3,-3.05)
  rect 3.8x2 smd: 4(0,3.05)
  silkscreen extent -3.35,-3.2 3.3,1.8, body extent -3.25,-3.5 3.25,3.5, height 1.61
TC2030-MCP-NL [mil]
  round 31 smd paste-33: 1(-50,-25) 2(-50,25) 3(0,-25) 4(0,25) 5(50,-25) 6(50,25)
  round 20 hole 39 unplated: ""(-100,0) ""(100,-40) ""(100,40)
  silkscreen extent -121,-61 121,61
TO-252-2L [mm]
  rect 1.5x2.5 smd: 1(-2.3,-3.45) 3(2.3,-3.45)
  rect 7x7 smd: 2(0,3.45)
  silkscreen extent -3.35,-3.53 3.33,-0.2, body extent -3.27,-4.31 3.27,5.63, height 2.34
TSSOP-20 [mm]
  rect 1.6x0.32 smd: 1(-2.8,2.925) 2(-2.8,2.275) 3(-2.8,1.625) 4(-2.8,0.975) 5(-2.8,0.325) 6(-2.8,-0.325) 7(-2.8,-0.975) 8(-2.8,-1.625) 9(-2.8,-2.275) 10(-2.8,-2.925) 11(2.8,-2.925) 12(2.8,-2.275) 13(2.8,-1.625) 14(2.8,-0.975) 15(2.8,-0.325) 16(2.8,0.325) 17(2.8,0.975) 18(2.8,1.625) 19(2.8,2.275) 20(2.8,2.925)
  silkscreen extent -3.88,-3.3 1.95,3.3, body extent -3.2,-3.25 3.2,3.25, height 1.2
TYPE-C-31-M-12_ [mm]
  rect 0.6x1.2 smd: A1/B12(-3.2,2.375) A4/B9(-2.4,2.375) B1/A12(3.2,2.375) B4/A9(2.4,2.375)
  rect 0.3x1.2 smd: A5(-1.25,2.375) A6(-0.25,2.375) A7(0.25,2.375) A8(1.25,2.375) B5(1.75,2.375) B6(0.75,2.375) B7(-0.75,2.375) B8(-1.75,2.375)
  round 0 hole 0.62 unplated: MH(-2.89,1.305) MH(2.89,1.305)
  oval 0.9x2 hole 0.6 slot 1.7 at 90 deg: S1(4.325,1.805) S4(-4.325,1.805)
  oval 0.9x1.7 hole 0.6 slot 1.4 at 90 deg: S2(4.325,-2.375) S3(-4.325,-2.375)
  silkscreen extent -4.5,-3.57 4.5,0.44, body extent -4.47,-5.01 4.47,2.89, height 3.31
WAFER-PH2.0-2PWB [mm]
  rect 1x3.5 smd: 1(-1,2.85) 2(1,2.85)
  rect 1.5x3.5 smd: MP1(-3.35,-2.85) MP2(3.35,-2.85)
  silkscreen extent -4.09,-4.85 4.04,3.56, body extent -4.03,-4.8 3.97,3.7, height 5.59

## Part data
C1: library part GRM188R6YA475KE15D, "CAP CER 4.7UF 35V X5R 0603", Case Code (Imperial)=0603, Case Code (Metric)=1608, Dielectric=X5R, Dielectric Material=Ceramic, Manufacturer=Murata, Manufacturer Lifecycle Status="IN PRODUCTION", Max Operating Temperature=85°C, Min Operating Temperature=-55°C, Tolerance=10%, Voltage=35V, Case/Package=0603, ComponentLink1Description=https://datasheet.octopart.com:443/GRM188R6YA475KE15D-Murata-datasheet-27203393.pdf?src-supplier=Newark, ComponentLink1URL=https://datasheet.octopart.com:443/GRM188R6YA475KE15D-Murata-datasheet-27203393.pdf?src-supplier=Newark, ComponentLink2Description=https://datasheet.octopart.com:443/GRM188R6YA475KE15D-Murata-datasheet-62317201.pdf?src-supplier=element14+APAC, ComponentLink2URL=https://datasheet.octopart.com:443/GRM188R6YA475KE15D-Murata-datasheet-62317201.pdf?src-supplier=element14+APAC, ComponentLink3Description=https://datasheet.octopart.com:443/GRM188R6YA475KE15D-Murata-datasheet-14397410.pdf?src-supplier=Future+Electronics, ComponentLink3URL=https://datasheet.octopart.com:443/GRM188R6YA475KE15D-Murata-datasheet-14397410.pdf?src-supplier=Future+Electronics, ComponentLink4Description=https://datasheet.octopart.com:443/GRM188R6YA475KE15D-Murata-datasheet-165579666.pdf?src-supplier=TME, ComponentLink4URL=https://datasheet.octopart.com:443/GRM188R6YA475KE15D-Murata-datasheet-165579666.pdf?src-supplier=TME, ComponentLink5Description=https://datasheet.octopart.com:443/GRM188R6YA475KE15D-Murata-datasheet-141274968.pdf?src-supplier=Ciiva, ComponentLink5URL=https://datasheet.octopart.com:443/GRM188R6YA475KE15D-Murata-datasheet-141274968.pdf?src-supplier=Ciiva, ComponentLink6Description=https://datasheet.octopart.com:443/GRM188R6YA475KE15D-Murata-datasheet-140705175.pdf?src-supplier=Ciiva, ComponentLink6URL=https://datasheet.octopart.com:443/GRM188R6YA475KE15D-Murata-datasheet-140705175.pdf?src-supplier=Ciiva, ComponentLink7Description=https://datasheet.octopart.com:443/GRM188R6YA475KE15D-Murata-datasheet-138742923.pdf?src-supplier=Ciiva, ComponentLink7URL=https://datasheet.octopart.com:443/GRM188R6YA475KE15D-Murata-datasheet-138742923.pdf?src-supplier=Ciiva, ComponentLink8Description=https://datasheet.octopart.com/GRM188R6YA475KE15D-Murata-datasheet-12515295.pdf, ComponentLink8URL=https://datasheet.octopart.com/GRM188R6YA475KE15D-Murata-datasheet-12515295.pdf, ComponentLink9Description=https://datasheet.octopart.com/GRM188R6YA475KE15D-Murata-datasheet-12510076.pdf, ComponentLink9URL=https://datasheet.octopart.com/GRM188R6YA475KE15D-Murata-datasheet-12510076.pdf, ComponentLink10Description=https://datasheet.octopart.com/GRM188R6YA475KE15D-Murata-datasheet-11978611.pdf, ComponentLink10URL=https://datasheet.octopart.com/GRM188R6YA475KE15D-Murata-datasheet-11978611.pdf, ComponentLink11Description=https://datasheet.octopart.com/GRM188R6YA475KE15D-Murata-datasheet-10025737.pdf, ComponentLink11URL=https://datasheet.octopart.com/GRM188R6YA475KE15D-Murata-datasheet-10025737.pdf, ComponentLink12Description=https://datasheet.octopart.com/GRM188R6YA475KE15D-Murata-datasheet-8819587.pdf, ComponentLink12URL=https://datasheet.octopart.com/GRM188R6YA475KE15D-Murata-datasheet-8819587.pdf, ComponentLink13Description=https://datasheet.octopart.com:443/GRM188R6YA475KE15D-Murata-datasheet-150009168.pdf?src-supplier=Arrow.cn, ComponentLink13URL=https://datasheet.octopart.com:443/GRM188R6YA475KE15D-Murata-datasheet-150009168.pdf?src-supplier=Arrow.cn, ComponentLink14Description=http://sigma.octopart.com:80/reach_statement/Murata-company-16.pdf?src-supplier=Compliance+Statements, ComponentLink14URL=http://sigma.octopart.com:80/reach_statement/Murata-company-16.pdf?src-supplier=Compliance+Statements, Composition=Ceramic, Depth=800µm, Height=800µm, Item Type=Capacitors, Lead Free="Lead Free", Length=1.6mm, Lifecycle Status=Production, Manufacturer Part Number=GRM188R6YA475KE15D, Material=Ceramic, Mounting Technology="Surface Mount", Number of Terminals=2, Pricing="4000=0.046, 8000=0.039, 24000=0.036 (USD)", REACH SVHC=Yes, RoHS=Compliant, Schedule B="8532240020, 8532240020|8532240020|8532240020|8532240020|8532240020|8532240020|8532240020|8532240020|8532240020|8532240020|8532240020|8532240020|8532240020|8532240020|8532240020|8532240020|8532240020|8532240020|8532240020|8532240020|8532240020|8532240020|8532240020, 8532240020|8532240020|8532240020|8532240020|8532240020|8532240020|8532240020|8532240020|8532240020|8532240020|8532240020|8532240020|8532240020|8532240020|8532240020|8532240020|8532240020|8532240020|8532240020|8532240020|8532240020|8532240020|8532240020|85", Stock=256000, Supplier="Arrow Electronics", Supplier Part Number=GRM188R6YA475KE15D, Termination=SMD/SMT, Thickness=800µm, Voltage Rating=35V, Voltage Rating (DC)=35V, Weight=6.293594mg, Width=800µm
C2 C3 C4 C6 C10 C12 C13 C15 C17 C28 C30 C31 C36 C37 C38 C39 C40: library part CC0603KRX5R9BB104, "CAP CER 0.1UF 50V X5R 0603", Case Code (Imperial)=0603, Case Code (Metric)=1608, Dielectric=X5R, LCSC Part Number=C110022, Manufacturer=Yageo, Max Operating Temperature=85°C, Min Operating Temperature=-55°C, Package Quantity=4000, Supplier Part Number 1=311-4046-1-ND, Tolerance=10%, Voltage Rating=50V, Capacitance=100nF, Case/Package=0603, Category="Ceramic Capacitors", ComponentLink1Description=http://www.mouser.com/ds/2/447/Yageo_UPY-GP_NP0_16V-to-50V_9-358835.pdf?src-supplier=Mouser, ComponentLink1URL=http://www.mouser.com/ds/2/447/Yageo_UPY-GP_NP0_16V-to-50V_9-358835.pdf?src-supplier=Mouser, ComponentLink2Description=https://www.yageo.com/upload/media/product/productsearch/datasheet/mlcc/UPY-GPHC_X5R_4V-to-50V_26.pdf?src-supplier=Digi-Key, ComponentLink2URL=https://www.yageo.com/upload/media/product/productsearch/datasheet/mlcc/UPY-GPHC_X5R_4V-to-50V_26.pdf?src-supplier=Digi-Key, ComponentLink3Description=http://www.yageo.com/exep/pages/download/literatures/ProductSelectionGuide%202014_Final_2.pdf?src-supplier=Digi-Key, ComponentLink3URL=http://www.yageo.com/exep/pages/download/literatures/ProductSelectionGuide%202014_Final_2.pdf?src-supplier=Digi-Key, Halogen Free="Halogen Free", Item Type=Capacitor, Lead Free="Lead Free", Length=0.063inch, Manufacturer Part Number=CC0603KRX5R9BB104, Mount="Surface Mount", Packaging="Tape and Reel", Pricing 1="1=0.10000, 10=0.05200, 50=0.02820, 100=0.02310, 500=0.01648, 1000=0.01294 (USD)", RoHS=Yes, Stock 1=152253, Supplier 1=Digi-Key, Termination=SMD/SMT, Thickness=0.035inch, Voltage Rating (DC)=50V, Weight=7.1E-05oz, Width=0.031inch
C5 C18: library part TAJC106K035RNJ, "CAP TANT 10UF 10% 35V 2312", Case Code (Imperial)=2312, Case Code (Metric)=6032, Case/Package=Molded, Dielectric Material=Tantalum, ESR (Equivalent Series Resistance)=1.6R, LCSC Part Number=C7211, Leakage Current=3.5uA, Manufacturer="Kyocera AVX", Max Operating Temperature=125°C, Min Operating Temperature=-55°C, Package Quantity=500, Ripple Current=262mA, Tolerance=20%, Voltage=25V, Voltage Rating=35V, ComponentLink1Description=https://datasheet.ciiva.com/11793/0900766b80ccdc61-11793205.pdf?src-supplier=Rs, ComponentLink1URL=https://datasheet.ciiva.com/11793/0900766b80ccdc61-11793205.pdf?src-supplier=Rs, ComponentLink2Description=https://datasheet.ciiva.com/26341/559442-da-01-en-tacc-c-6-0-mm-x-3-2-mm-x-2-6-mm-10-uf-26341782.pdf?src-supplier=Conrad, ComponentLink2URL=https://datasheet.ciiva.com/26341/559442-da-01-en-tacc-c-6-0-mm-x-3-2-mm-x-2-6-mm-10-uf-26341782.pdf?src-supplier=Conrad, ComponentLink3Description=https://datasheet.ciiva.com/5937/taj-5937099.pdf?src-supplier=Farnell, ComponentLink3URL=https://datasheet.ciiva.com/5937/taj-5937099.pdf?src-supplier=Farnell, ComponentLink4Description=https://datasheet.ciiva.com/7730/taj-7730983.pdf?src-supplier=Element14, ComponentLink4URL=https://datasheet.ciiva.com/7730/taj-7730983.pdf?src-supplier=Element14, ComponentLink5Description=https://datasheet.ciiva.com/7730/1703059-7730751.pdf?src-supplier=Element14, ComponentLink5URL=https://datasheet.ciiva.com/7730/1703059-7730751.pdf?src-supplier=Element14, ComponentLink6Description=https://datasheet.ciiva.com/7730/1703059-7730750.pdf?src-supplier=Element14, ComponentLink6URL=https://datasheet.ciiva.com/7730/1703059-7730750.pdf?src-supplier=Element14, ComponentLink7Description=https://datasheet.ciiva.com/7730/1680476-7730748.pdf?src-supplier=Element14, ComponentLink7URL=https://datasheet.ciiva.com/7730/1680476-7730748.pdf?src-supplier=Element14, ComponentLink8Description=https://datasheet.ciiva.com/7730/13070-7730749.pdf?src-supplier=Element14, ComponentLink8URL=https://datasheet.ciiva.com/7730/13070-7730749.pdf?src-supplier=Element14, ComponentLink9Description=https://datasheet.ciiva.com/264/taj-264350.pdf?src-supplier=Digikey, ComponentLink9URL=https://datasheet.ciiva.com/264/taj-264350.pdf?src-supplier=Digikey, ComponentLink10Description=https://datasheet.ciiva.com/264/taj-264349.pdf?src-supplier=Digikey, ComponentLink10URL=https://datasheet.ciiva.com/264/taj-264349.pdf?src-supplier=Digikey, ComponentLink11Description=https://datasheet.ciiva.com/264/taj-264351.pdf?src-supplier=Digikey, ComponentLink11URL=https://datasheet.ciiva.com/264/taj-264351.pdf?src-supplier=Digikey, ComponentLink12Description=https://datasheet.ciiva.com/12911/taj-27497-12911561.pdf?src-supplier=Mouser, ComponentLink12URL=https://datasheet.ciiva.com/12911/taj-27497-12911561.pdf?src-supplier=Mouser, ComponentLink13Description=https://datasheet.ciiva.com/14590/70001050-14590313.pdf?src-supplier=Allied+Electronics, ComponentLink13URL=https://datasheet.ciiva.com/14590/70001050-14590313.pdf?src-supplier=Allied+Electronics, ComponentLink14Description=https://datasheet.ciiva.com/3004/taj-3004476.pdf?src-supplier=Avnet, ComponentLink14URL=https://datasheet.ciiva.com/3004/taj-3004476.pdf?src-supplier=Avnet, ComponentLink15Description=https://datasheet.ciiva.com/15163/getdatasheetpartid-110753-15163367.pdf?src-supplier=Verical, ComponentLink15URL=https://datasheet.ciiva.com/15163/getdatasheetpartid-110753-15163367.pdf?src-supplier=Verical, ComponentLink16Description=https://datasheet.ciiva.com/3004/taj-3004475.pdf?src-supplier=Avnet, ComponentLink16URL=https://datasheet.ciiva.com/3004/taj-3004475.pdf?src-supplier=Avnet, Construction=Flat, Depth=3.2mm, Dissipation Factor=6%, Features="General Purpose", Height=2.6mm, Item Type="Tantalum Capacitors", Lead Free="Lead Free", Length=6mm, Life (Hours)=2000Hour, Manufacturer Part Number=TAJC106K035RNJ, Mounting Technology="Surface Mount,PCB", Packaging="Tape and Reel", Pins=2, Polarity=Polar, Pricing="500=0.4611, 1000=0.4505, 2000=0.4399, 3000=0.4293, 4000=0.4187, 5000=0.4081, 50000=0.4028 (USD)", Radiation Hardening=No, Reach SVHC Compliant=No, RoHS=Yes, RoHS Compliant=Yes, Series=TAJ, Stock=20000, Supplier=Avnet, Supplier Part Number=TAJC106K035RNJ, Termination=SMD/SMT, Voltage Rating (DC)=35V, Width=3.2mm
C7 C8: library part CC0603FRNPO9BN470, "CAP CER 47PF 50V NPO 0603", LCSC Part Number=C519486, Manufacturer=Yageo, ComponentLink1Description=https://datasheet.ciiva.com/5425/upy-gp-np0-16v-to-50v-8-5425545.pdf?src-supplier=Mouser, ComponentLink1URL=https://datasheet.ciiva.com/5425/upy-gp-np0-16v-to-50v-8-5425545.pdf?src-supplier=Mouser, ComponentLink2Description=https://datasheet.ciiva.com/11586/upy-gp-np0-16v-to-50v-8-11586472.pdf?src-supplier=Avnet, ComponentLink2URL=https://datasheet.ciiva.com/11586/upy-gp-np0-16v-to-50v-8-11586472.pdf?src-supplier=Avnet, Item Type=Capacitor, Manufacturer Part Number=CC0603FRNPO9BN470, Pricing="1=0.19, 10=0.126, 50=0.0756, 100=0.0594, 500=0.0439, 1000=0.03634 (USD)", RoHS=Yes, Stock=37282, Supplier=Digikey
C9 C14: library part C3216X5R1V156M160AC, "CAP CER 15UF 35V X5R 1206", Case Code (Imperial)=1206, Case Code (Metric)=3216, Dielectric=X5R, Dielectric Material=Ceramic, Manufacturer=TDK, Manufacturer Lifecycle Status=PRODUCTION, Max Operating Temperature=85°C, Min Operating Temperature=-55°C, Supplier Part Number=71AH3361, Tolerance=20%, Voltage Rating=35V, Case/Package=1206, China RoHS=Compliant, ComponentLink1Description=https://datasheet.octopart.com:443/C3216X5R1V156M160AC-TDK-datasheet-175423548.pdf?src-supplier=TME, ComponentLink1URL=https://datasheet.octopart.com:443/C3216X5R1V156M160AC-TDK-datasheet-175423548.pdf?src-supplier=TME, ComponentLink2Description=https://datasheet.octopart.com:443/C3216X5R1V156M160AC-TDK-datasheet-151546523.pdf?src-supplier=TDK, ComponentLink2URL=https://datasheet.octopart.com:443/C3216X5R1V156M160AC-TDK-datasheet-151546523.pdf?src-supplier=TDK, ComponentLink3Description=https://datasheet.octopart.com/C3216X5R1V156M160AC-TDK-datasheet-41194876.pdf, ComponentLink3URL=https://datasheet.octopart.com/C3216X5R1V156M160AC-TDK-datasheet-41194876.pdf, Composition=Ceramic, Height=1.6mm, Item Type=Capacitors, Lead Free="Lead Free", Length=3.2mm, Lifecycle Status=Production, Manufacturer Part Number=C3216X5R1V156M160AC, Material=Ceramic, Max Length=3.4mm, Max Width=1.8mm, Min Length=3mm, Min Width=1.4mm, Mounting Technology="Surface Mount", Number of Terminals=2, Packaging=Digi-Reel®, Pricing="1=0.987, 10=0.517, 25=0.485, 50=0.453, 100=0.421 (USD)", REACH SVHC=Yes, RoHS=Compliant, Schedule B="8532240020, 8532240020|8532240020|8532240020|8532240020|8532240020", Stock=2242, Supplier=Avnet, Termination=SMD/SMT, Voltage Rating (DC)=35V, Width=1.6mm
C11: library part CC0603KRX7R9BB103, "CAP CER 10000PF 50V X7R 0603", Capacitance=10nF, Case Code (Imperial)=0603, Case Code (Metric)=1608, Dielectric=X7R, Insulation Resistance=100GR, LCSC Part Number=C100042, Manufacturer=Yageo, Max Operating Temperature=125°C, Min Operating Temperature=-55°C, Package Quantity=1, Supplier Part Number 1=311-1085-6-ND, Tolerance=10%, Voltage=50V, Case/Package=0603, ComponentLink1Description=http://www.farnell.com/datasheets/1734573.pdf?src-supplier=Element14, ComponentLink1URL=http://www.farnell.com/datasheets/1734573.pdf?src-supplier=Element14, ComponentLink2Description=http://www.yageo.com/documents/recent/UPY-GPHC_X7R_6.3V-to-50V_18.pdf?src-supplier=Digi-Key, ComponentLink2URL=http://www.yageo.com/documents/recent/UPY-GPHC_X7R_6.3V-to-50V_18.pdf?src-supplier=Digi-Key, ComponentLink3Description=http://www.farnell.com/datasheets/2167236.pdf?src-supplier=Mouser, ComponentLink3URL=http://www.farnell.com/datasheets/2167236.pdf?src-supplier=Mouser, ComponentLink4Description=http://www.farnell.com/datasheets/70765.pdf?src-supplier=Element14, ComponentLink4URL=http://www.farnell.com/datasheets/70765.pdf?src-supplier=Element14, ComponentLink5Description=http://www.yageo.com/documents/recent/UPY-GPHC_X7R_6.3V-to-50V_8.pdf?src-supplier=Avnet+Europe, ComponentLink5URL=http://www.yageo.com/documents/recent/UPY-GPHC_X7R_6.3V-to-50V_8.pdf?src-supplier=Avnet+Europe, ComponentLink6Description=http://www.farnell.com/datasheets/1489800.pdf?src-supplier=Element14, ComponentLink6URL=http://www.farnell.com/datasheets/1489800.pdf?src-supplier=Element14, ComponentLink7Description=https://www.verical.com/server-webapp/html/getDatasheet?partID=403582&src-supplier=Verical, ComponentLink7URL=https://www.verical.com/server-webapp/html/getDatasheet?partID=403582&src-supplier=Verical, Composition=Ceramic, Depth=0.8mm, Halogen Free="Halogen Free", Height=0.8mm, Lead Free="Lead Free", Length=1.6mm, Manufacturer Part Number=CC0603KRX7R9BB103, Material=Ceramic, Mount="Surface Mount", Number of Pins=2, Packaging="Tape and Reel", Pricing 1="1=0.1, 10=0.038, 100=0.0171, 500=0.01224, 1000=0.00962 (USD)", Radiation Hardening=No, REACH SVHC="No SVHC", Stock 1=8411467, Supplier 1=Digi-Key, Termination=SMD/SMT, Thickness=0.035inch, Voltage Rating=50V, Voltage Rating (DC)=50V, Width=0.031inch
C19: library part 08055C105KAT2A, "CAP CER 1UF 50V X7R 0805", Case Code (Imperial)=0805, Case Code (Metric)=2012, Dielectric=X7R, LCSC Part Number=C2167382, Manufacturer="Kyocera AVX", Max Operating Temperature=125°C, Min Operating Temperature=-55°C, Package Quantity=1, Tolerance=10%, Voltage=50V, Case/Package=0805, ComponentLink1Description=https://datasheet.ciiva.com/25613/0900766b810a29b7-25613127.pdf?src-supplier=Rs, ComponentLink1URL=https://datasheet.ciiva.com/25613/0900766b810a29b7-25613127.pdf?src-supplier=Rs, ComponentLink2Description=https://datasheet.ciiva.com/6268/cx7r-6268826.pdf?src-supplier=Digikey, ComponentLink2URL=https://datasheet.ciiva.com/6268/cx7r-6268826.pdf?src-supplier=Digikey, ComponentLink3Description=https://datasheet.ciiva.com/7812/cx7r-7812085.pdf?src-supplier=Element14, ComponentLink3URL=https://datasheet.ciiva.com/7812/cx7r-7812085.pdf?src-supplier=Element14, ComponentLink4Description=https://datasheet.ciiva.com/22706/1679506-22706999.pdf?src-supplier=Element14, ComponentLink4URL=https://datasheet.ciiva.com/22706/1679506-22706999.pdf?src-supplier=Element14, ComponentLink5Description=https://datasheet.ciiva.com/46385/1818074-46385893.pdf?src-supplier=Element14, ComponentLink5URL=https://datasheet.ciiva.com/46385/1818074-46385893.pdf?src-supplier=Element14, ComponentLink6Description=https://datasheet.ciiva.com/14887/cx7r-14887080.pdf?src-supplier=Digikey, ComponentLink6URL=https://datasheet.ciiva.com/14887/cx7r-14887080.pdf?src-supplier=Digikey, ComponentLink7Description=https://datasheet.ciiva.com/14887/cx7r-14887081.pdf?src-supplier=Digikey, ComponentLink7URL=https://datasheet.ciiva.com/14887/cx7r-14887081.pdf?src-supplier=Digikey, Depth=1.25mm, Item Type=Capacitors, Lead Free="Lead Free", Length=2.01mm, Manufacturer Part Number=08055C105KAT2A, Material=Ceramic, Mounting Technology="Surface Mount", Packaging="Tape and Reel", Pricing="10=1.518, 50=1.406, 100=1.309, 250=1.137, 500=0.98 (DKK)", Reach SVHC Compliant=No, RoHS=Yes, RoHS Compliant=Yes, Series=-, Stock=6530, Supplier=Rs, Termination=SMD/SMT, Thickness=0.037inch, Voltage Rating=50V, Width=0.049inch
C20 C21: library part C1608X5R1E106M080AC, "CAP CER 10UF 25V X5R 0603", Case Code (Imperial)=0603, Case Code (Metric)=1608, Dielectric=X5R, Dielectric Material=Ceramic, LCSC Part Number=C2168289, Manufacturer=TDK, Max Operating Temperature=85°C, Min Operating Temperature=-55°C, Package Quantity=1, Supplier Part Number 1=445-9015-1-ND, Tolerance=20%, Voltage Rating=25V, Capacitance=10uF, Case/Package=0603, Composition=Ceramic, Depth=0.8mm, Height=0.8mm, Item Type=Capacitor, Lead Free="Lead Free", Length=1.6mm, Manufacturer Part Number=C1608X5R1E106M080AC, Mount="Surface Mount", Packaging="Tape and Reel", Pricing 1="1=0.96, 10=0.704, 100=0.483, 500=0.38238, 1000=0.322 (USD)", REACH SVHC="No SVHC", Stock 1=61681, Supplier 1=Digi-Key, Termination=SMD/SMT, Thickness=0.039inch, Voltage Rating (DC)=25V, Weight=7.1E-05oz, Width=0.8mm
C22: library part 0603B471K500CT, "CAP CER 470PF 50V X7R 0603", Case Code (Imperial)=0603, Case Code (Metric)=1608, Case/Package=Ceramic, Dielectric=X7R, LCSC Part Number=C93192, Manufacturer="Walsin Technologies", Max Operating Temperature=125°C, Min Operating Temperature=-55°C, Tolerance=10%, Voltage Rating=50V, Capacitance=470pF, Category="Ceramic Capacitors", ComponentLink1Description=https://www.verical.com/server-webapp/html/getDatasheet?partID=467798&src-supplier=Verical, ComponentLink1URL=https://www.verical.com/server-webapp/html/getDatasheet?partID=467798&src-supplier=Verical, ComponentLink2Description=http://www.farnell.com/datasheets/2340522.pdf?src-supplier=Farnell, ComponentLink2URL=http://www.farnell.com/datasheets/2340522.pdf?src-supplier=Farnell, ComponentLink3Description=http://www.passivecomponent.com/indexsea/0603B471K500CT-IS.pdf?src-supplier=Digi-Key, ComponentLink3URL=http://www.passivecomponent.com/indexsea/0603B471K500CT-IS.pdf?src-supplier=Digi-Key, ComponentLink4Description=http://www.passivecomponent.com/wp-content/uploads/2018/10/MLCC.pdf?src-supplier=Digi-Key, ComponentLink4URL=http://www.passivecomponent.com/wp-content/uploads/2018/10/MLCC.pdf?src-supplier=Digi-Key, ComponentLink5Description=http://www.farnell.com/datasheets/1958513.pdf?src-supplier=Element14, ComponentLink5URL=http://www.farnell.com/datasheets/1958513.pdf?src-supplier=Element14, ComponentLink6Description=http://www.farnell.com/datasheets/2340522.pdf?src-supplier=Newark, ComponentLink6URL=http://www.farnell.com/datasheets/2340522.pdf?src-supplier=Newark, Depth=0.8mm, Item Type=Capacitor, Lead Free="Lead Free", Length=1.6mm, Manufacturer Part Number=0603B471K500CT, Packaging="Tape and Reel", Pricing 1="4000=0.00550, 8000=0.00460, 12000=0.00440, 40000=0.00430 (USD)", Radiation Hardening=No, REACH SVHC=Unknown, RoHS=Yes, RoHS Compliant=Yes, Stock 1=136000, Supplier 1="Arrow Electronics", Supplier Part Number 1=0603B471K500CT, Voltage Rating (DC)=50V
C23: library part CC0805KKX5R9BB225, "CAP CER 2.2UF 50V X5R 0805", Case Code (Imperial)=0805, Case Code (Metric)=2012, Dielectric=X5R, LCSC Part Number=C326581, Manufacturer=Yageo, Max Operating Temperature=85°C, Min Operating Temperature=-55°C, Package Quantity=3000, Resistor Type=Ceramic, Supplier Part Number 1=603-CC805KKX5R9BB225, Tolerance=10%, Voltage Rating=50V, Case/Package=0805, Category="Ceramic Capacitors", ComponentLink1Description=http://www.mouser.com/ds/2/447/Yageo_UPY-GP_NP0_16V-to-50V_9-358835.pdf?src-supplier=Mouser, ComponentLink1URL=http://www.mouser.com/ds/2/447/Yageo_UPY-GP_NP0_16V-to-50V_9-358835.pdf?src-supplier=Mouser, ComponentLink2Description=http://www.yageo.com/documents/recent/UPY-GPHC_X5R_4V-to-50V_25.pdf?src-supplier=Digi-Key, ComponentLink2URL=http://www.yageo.com/documents/recent/UPY-GPHC_X5R_4V-to-50V_25.pdf?src-supplier=Digi-Key, Halogen Free="Halogen Free", Item Type=Capacitor, Lead Free="Lead Free", Length=0.079inch, Manufacturer Part Number=CC0805KKX5R9BB225, Mounting Technology="Surface Mount", Packaging="Tape and Reel", Pricing 1="1=0.26000, 10=0.12100, 50=0.12100, 100=0.08700, 1000=0.06700, 10000=0.05000 (USD)", RoHS=Yes, RoHS Compliant=Yes, Stock 1=3880, Supplier 1=Mouser, Termination=SMD/SMT, Thickness=0.057inch, Voltage Rating (DC)=50V, Weight=0.000194oz, Width=1.25mm
C25: library part CC0603JRNPO9BN472, "CAP CER 4700PF 50V C0G/NPO 0603", LCSC Part Number=C576818, Manufacturer=Yageo, Supplier Part Number 1=13-CC0603JRNPO9BN472CT-ND, Category="Ceramic Capacitors", ComponentLink1Description=LCSC, ComponentLink1URL=https://www.lcsc.com/product-detail/Multilayer-Ceramic-Capacitors-MLCC-SMD-SMT_YAGEO-CC0603JRNPO9BN472_C576818.html, Item Type=Capacitor, Manufacturer Part Number=CC0603JRNPO9BN472, Pricing 1="1=0.48000, 10=0.33000, 50=0.23100, 100=0.19800, 500=0.14854, 1000=0.12543 (USD)", RoHS=Yes, RoHS Compliant=Yes, Stock 1=31779, Supplier 1=Digi-Key
C26 C27 C32 C33 C34 C35: library part C1608X7R1E105K080AB, "CAP CER 1UF 25V X7R 0603", Case Code (Imperial)=0603, Case Code (Metric)=1608, Dielectric=X7R, Dielectric Material=4241ConductorMaterial, Manufacturer=TDK, Max Operating Temperature=125°C, Min Operating Temperature=-55°C, Package Quantity=1, Tolerance=10%, Voltage=25V, Case/Package=0603, ComponentLink1Description=https://datasheet.ciiva.com/23802/1796654-23802776.pdf?src-supplier=Newark, ComponentLink1URL=https://datasheet.ciiva.com/23802/1796654-23802776.pdf?src-supplier=Newark, ComponentLink2Description=https://datasheet.ciiva.com/22725/1913358-22725530.pdf?src-supplier=Element14, ComponentLink2URL=https://datasheet.ciiva.com/22725/1913358-22725530.pdf?src-supplier=Element14, ComponentLink3Description=https://datasheet.ciiva.com/28693/mlcc-commercial-general-en-28693447.pdf?src-supplier=Element14, ComponentLink3URL=https://datasheet.ciiva.com/28693/mlcc-commercial-general-en-28693447.pdf?src-supplier=Element14, ComponentLink4Description=https://datasheet.ciiva.com/6290/tdkmlcccaprange-6290854.pdf?src-supplier=Digikey, ComponentLink4URL=https://datasheet.ciiva.com/6290/tdkmlcccaprange-6290854.pdf?src-supplier=Digikey, ComponentLink5Description=https://datasheet.ciiva.com/26834/getdatasheetpartid-727834-26834380.pdf?src-supplier=Verical, ComponentLink5URL=https://datasheet.ciiva.com/26834/getdatasheetpartid-727834-26834380.pdf?src-supplier=Verical, Construction=Flat, Depth=0.8mm, Height=0.8mm, Item Type=Capacitors, Lead Free="Lead Free", Length=1.6mm, Manufacturer Part Number=C1608X7R1E105K080AB, Material=4241ConductorMaterial, Mounting Technology="Surface Mount", Packaging="Tape and Reel", Pricing="1=0.18, 10=0.103, 50=0.0722, 100=0.0627, 500=0.04664, 1000=0.04163 (USD)", Radiation Hardening=No, Reach SVHC Compliant=No, RoHS=Yes, RoHS Compliant=Yes, Series=C, Stock=239206, Supplier=Digikey, Thickness=0.037inch, Voltage Rating=25V, Width=0.031inch
D1: "SMB(DO-214AA)", LCSC Part Number=C493201, Manufacturer=SMC, Item Type="TVS Diode", Manufacturer Part Number=SMBJ24A, Package=SMB(DO-214AA)
D2: "LED BLUE CLEAR 0602 SMD R/A", Case/Package=0602, Color=Blue, Forward Current=20mA, Forward Voltage=3.1V, Manufacturer="QT Brightek", Max Operating Temperature=80°C, Min Operating Temperature=-40°C, Power Dissipation=111mW, Reverse Voltage=5V, ComponentLink1Description=https://datasheet.octopart.com:443/QBLP617-IB-QT-Brightek-datasheet-140961254.pdf?src-supplier=IHS, ComponentLink1URL=https://datasheet.octopart.com:443/QBLP617-IB-QT-Brightek-datasheet-140961254.pdf?src-supplier=IHS, Height=600µm, Item Type=LEDs, Luminous Intensity=63mcd, Manufacturer Part Number=QBLP617-IB, Mounting Technology="Surface Mount", Number of Circuits=1, Number of Terminals=2, Pricing="1=0.0007 (USD)", REACH SVHC=Yes, RoHS=Compliant, Schedule B="8541402000, 8541402000|8541402000|8541402000|8541402000|8541402000, 8541410000", Shape=Rectangular, Stock=1867, Supplier="Arrow Electronics", Supplier Part Number=QBLP617-IB, Terminal Pitch=2.1mm, Viewing Angle=140°, Wavelength=470nm
D3 D4: "DIODE GEN PURP 100V 300MA SOD123", Average Rectified Current=300mA, Current Rating=150mA, Forward Voltage=1.25V, LCSC Part Number=C83528, Manufacturer=Diodes, Max Forward Surge Current (Ifsm)=2A, Max Operating Temperature=150°C, Max Repetitive Reverse Voltage (Vrrm)=100V, Max Reverse Current=1uA, Min Operating Temperature=-65°C, Package Quantity=3000, Power Dissipation=400mW, Supplier Part Number 1=7634694, Voltage Rating (DC)=75V, Category="Rectifier Diodes", ComponentLink1Description=https://datasheet.ciiva.com/1179/1915529-1179304.pdf?src-supplier=Element14, ComponentLink1URL=https://datasheet.ciiva.com/1179/1915529-1179304.pdf?src-supplier=Element14, ComponentLink2Description=https://datasheet.ciiva.com/22695/1915529-22695239.pdf?src-supplier=Element14, ComponentLink2URL=https://datasheet.ciiva.com/22695/1915529-22695239.pdf?src-supplier=Element14, ComponentLink3Description=https://datasheet.ciiva.com/8300/ds30086-8300392.pdf?src-supplier=Avnet, ComponentLink3URL=https://datasheet.ciiva.com/8300/ds30086-8300392.pdf?src-supplier=Avnet, ComponentLink4Description=https://datasheet.ciiva.com/15219/getdatasheetpartid-110030-15219548.pdf?src-supplier=Verical, ComponentLink4URL=https://datasheet.ciiva.com/15219/getdatasheetpartid-110030-15219548.pdf?src-supplier=Verical, ComponentLink5Description=https://datasheet.ciiva.com/8303/ds30086-8303197.pdf?src-supplier=Avnet, ComponentLink5URL=https://datasheet.ciiva.com/8303/ds30086-8303197.pdf?src-supplier=Avnet, ComponentLink6Description=https://datasheet.ciiva.com/911/ds30086-911735.pdf?src-supplier=Digi-Key, ComponentLink6URL=https://datasheet.ciiva.com/911/ds30086-911735.pdf?src-supplier=Digi-Key, ComponentLink7Description=https://datasheet.ciiva.com/911/ds30086-911736.pdf?src-supplier=Digi-Key, ComponentLink7URL=https://datasheet.ciiva.com/911/ds30086-911736.pdf?src-supplier=Digi-Key, ComponentLink8Description=https://datasheet.ciiva.com/911/ds30086-911734.pdf?src-supplier=Digi-Key, ComponentLink8URL=https://datasheet.ciiva.com/911/ds30086-911734.pdf?src-supplier=Digi-Key, ComponentLink9Description=https://datasheet.ciiva.com/4435/ds30086-4435128.pdf?src-supplier=Mouser, ComponentLink9URL=https://datasheet.ciiva.com/4435/ds30086-4435128.pdf?src-supplier=Mouser, Contact Plating=Tin,Matte, Element Configuration=Single, Forward Current=150mA, Height=1.25mm, Item Type=Diode, Lead Free="Lead Free", Length=2.85mm, Manufacturer Part Number=1N4148W-7-F, Max Reverse Voltage (DC)=100V, Max Surge Current=2A, Mounting Technology="Surface Mount", Output Current=150mA, Packaging="Tape and Reel", Peak Non-Repetitive Surge Current=2A, Pins=2, Polarity=Standard, Power Rating=400mW, Pricing 1="3000=0.01840, 12000=0.01760, 45000=0.01690, 120000=0.01640, 300000=0.01560 (USD)", Radiation Hardening=No, Reach SVHC Compliant=Yes, Recovery Time=4ns, Reverse Recovery Time=4ns, Reverse Recovery Time-Max=4ns, RoHS=Yes, RoHS Compliant=Yes, Series=-, Stock 1=32931000, Supplier 1="Future Electronics", Voltage=100V, Weight=0.000353oz, Width=1.7mm
D5: "TO-277 Schottky Barrier Diodes (SBD) ROHS", LCSC Part Number=C5240369, Manufacturer=TWGMC, Package=TO-277, ComponentLink1Description=LCSC, ComponentLink1URL=https://www.lcsc.com/product-detail/Schottky-Barrier-Diodes-SBD_TWGMC-SB10100L_C5240369.html, Item Type=Diode, Manufacturer Part Number=SB10100L